# Altium PCB PCI Express Mini L1.PCBDOC (part 1 of 7)
Units mm, origin at the board's own origin, x right, y up, seen from the top; angles counter-clockwise.
Board outline 70 x 83.2 mm, 6 copper layers (TopLayer, Layer 1, Layer 2, Layer 3, Layer 4, Bottom Layer), stack 0.914 mm thick; 402 components, 242 nets, 1301 pads, 522 vias.
Unrouted connection lines stored in the file: 225.
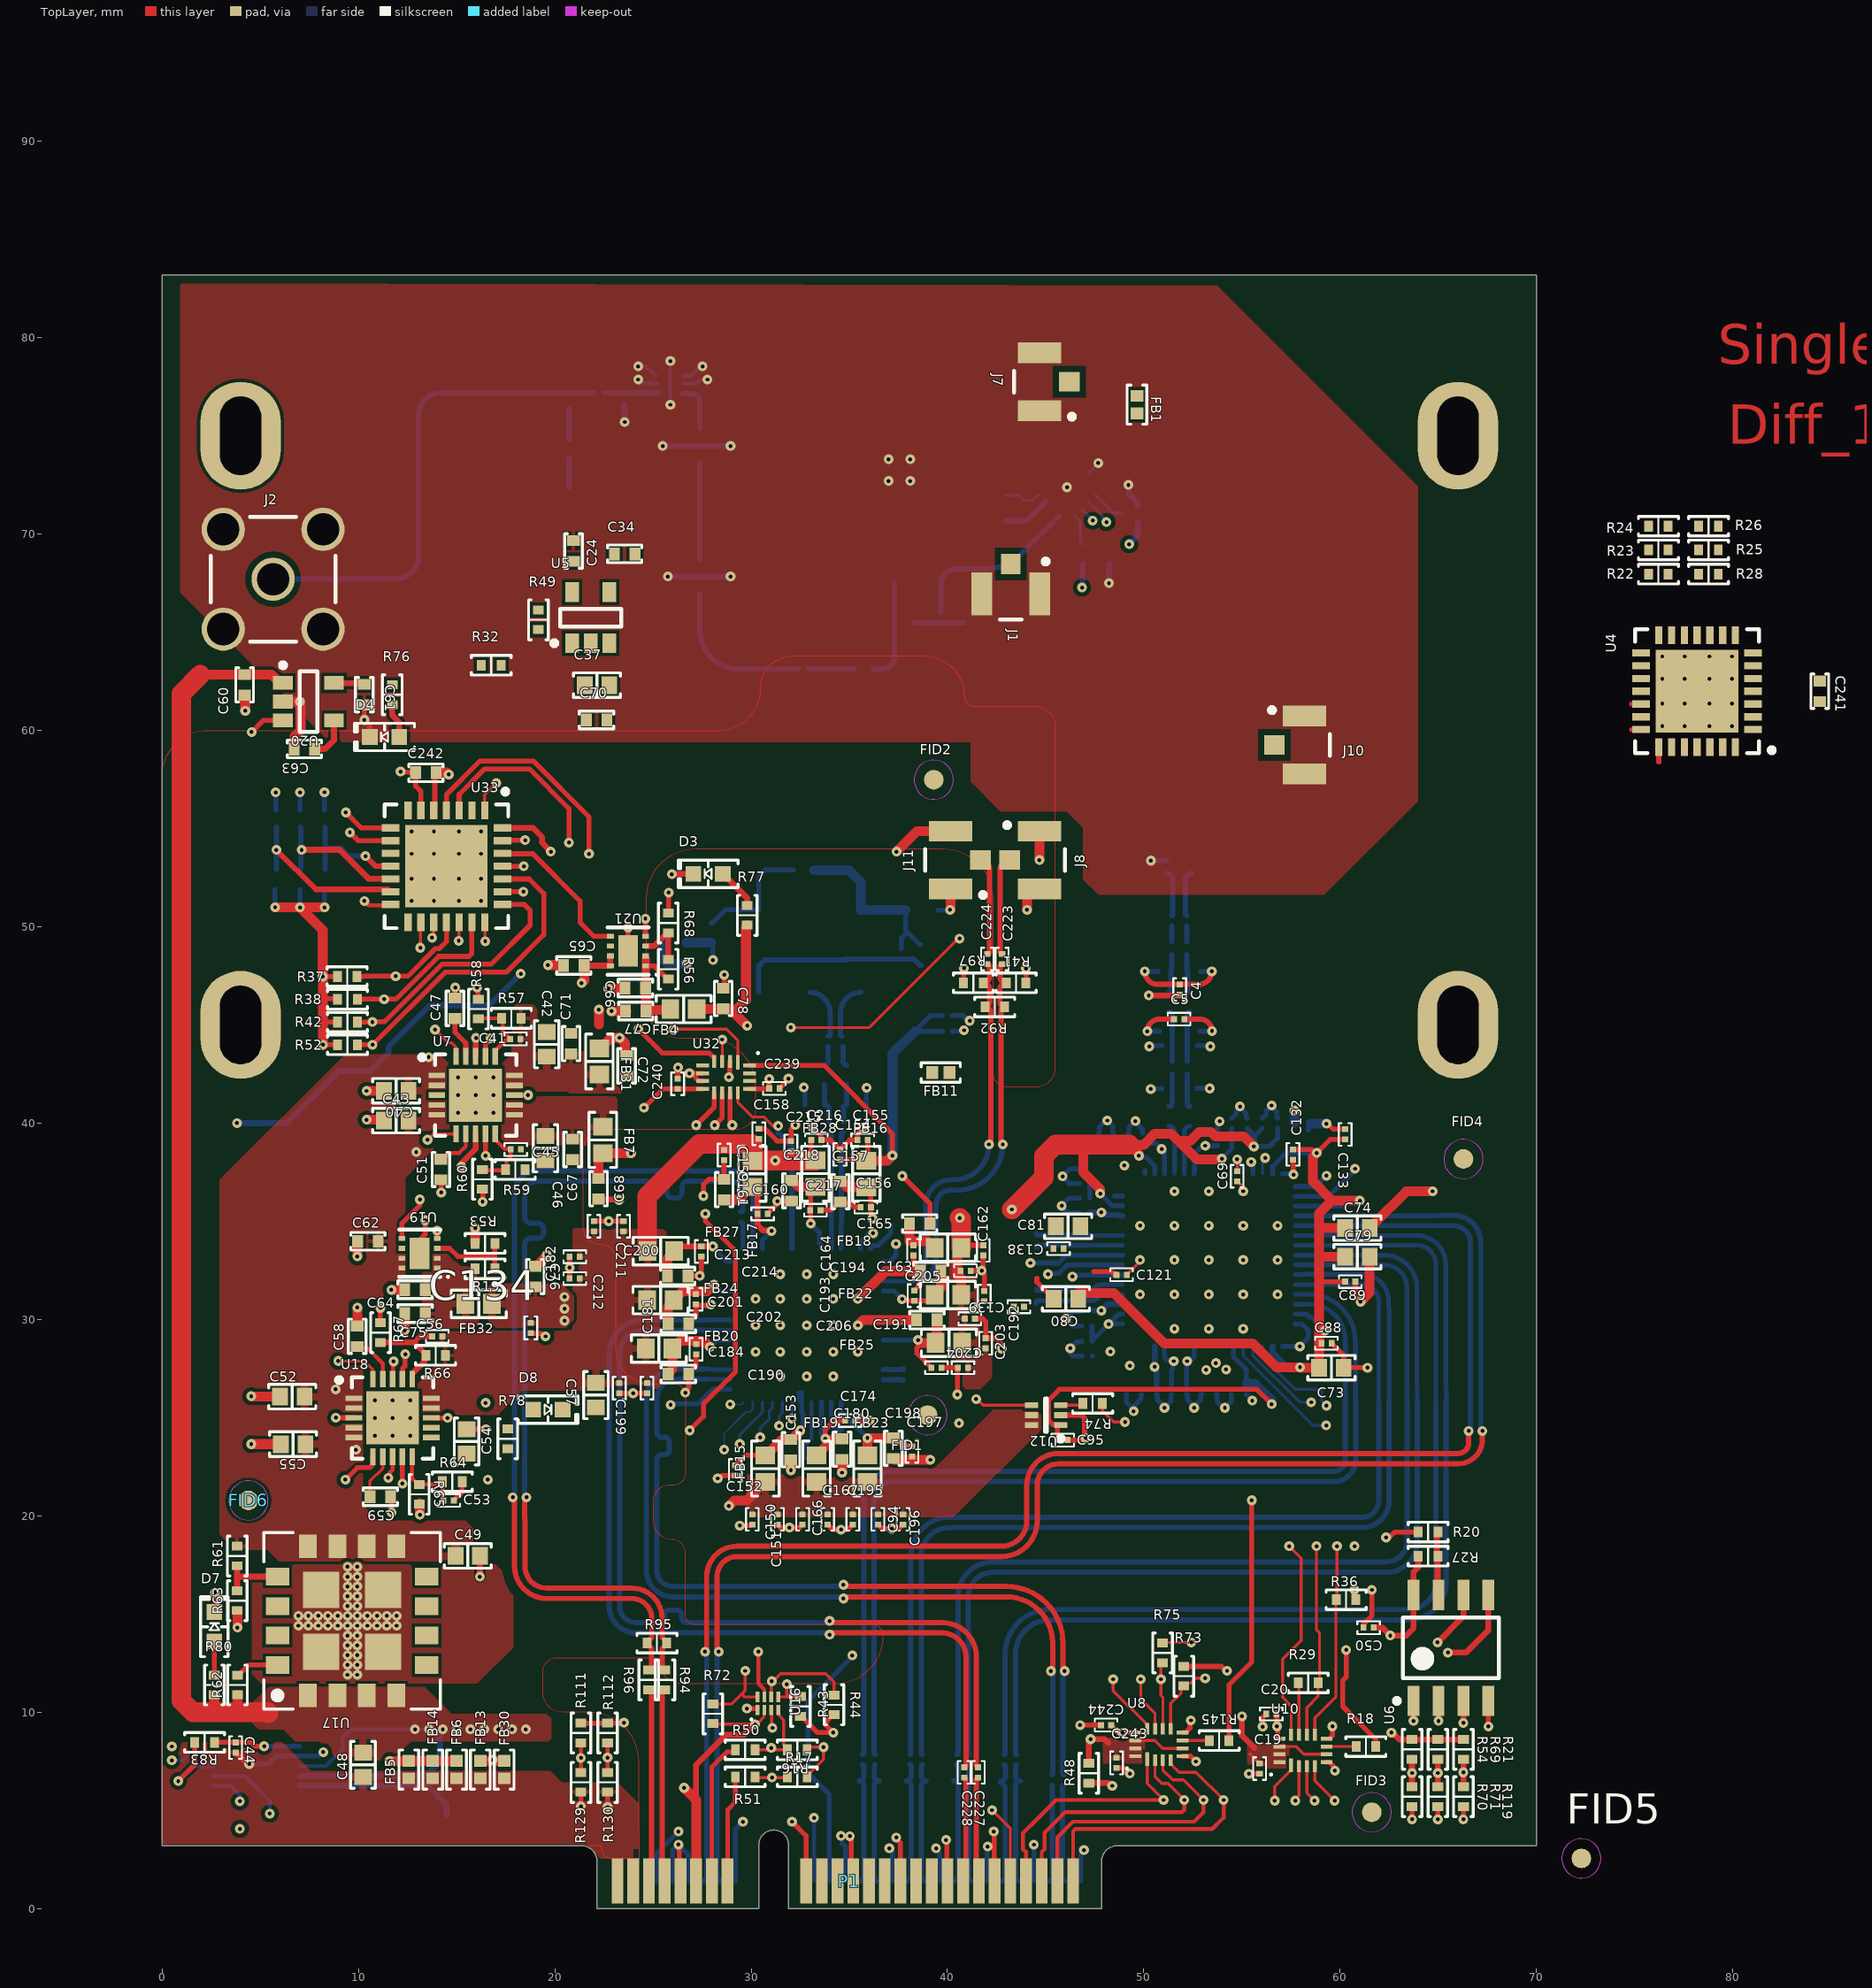
[diagram p0: TopLayer view]
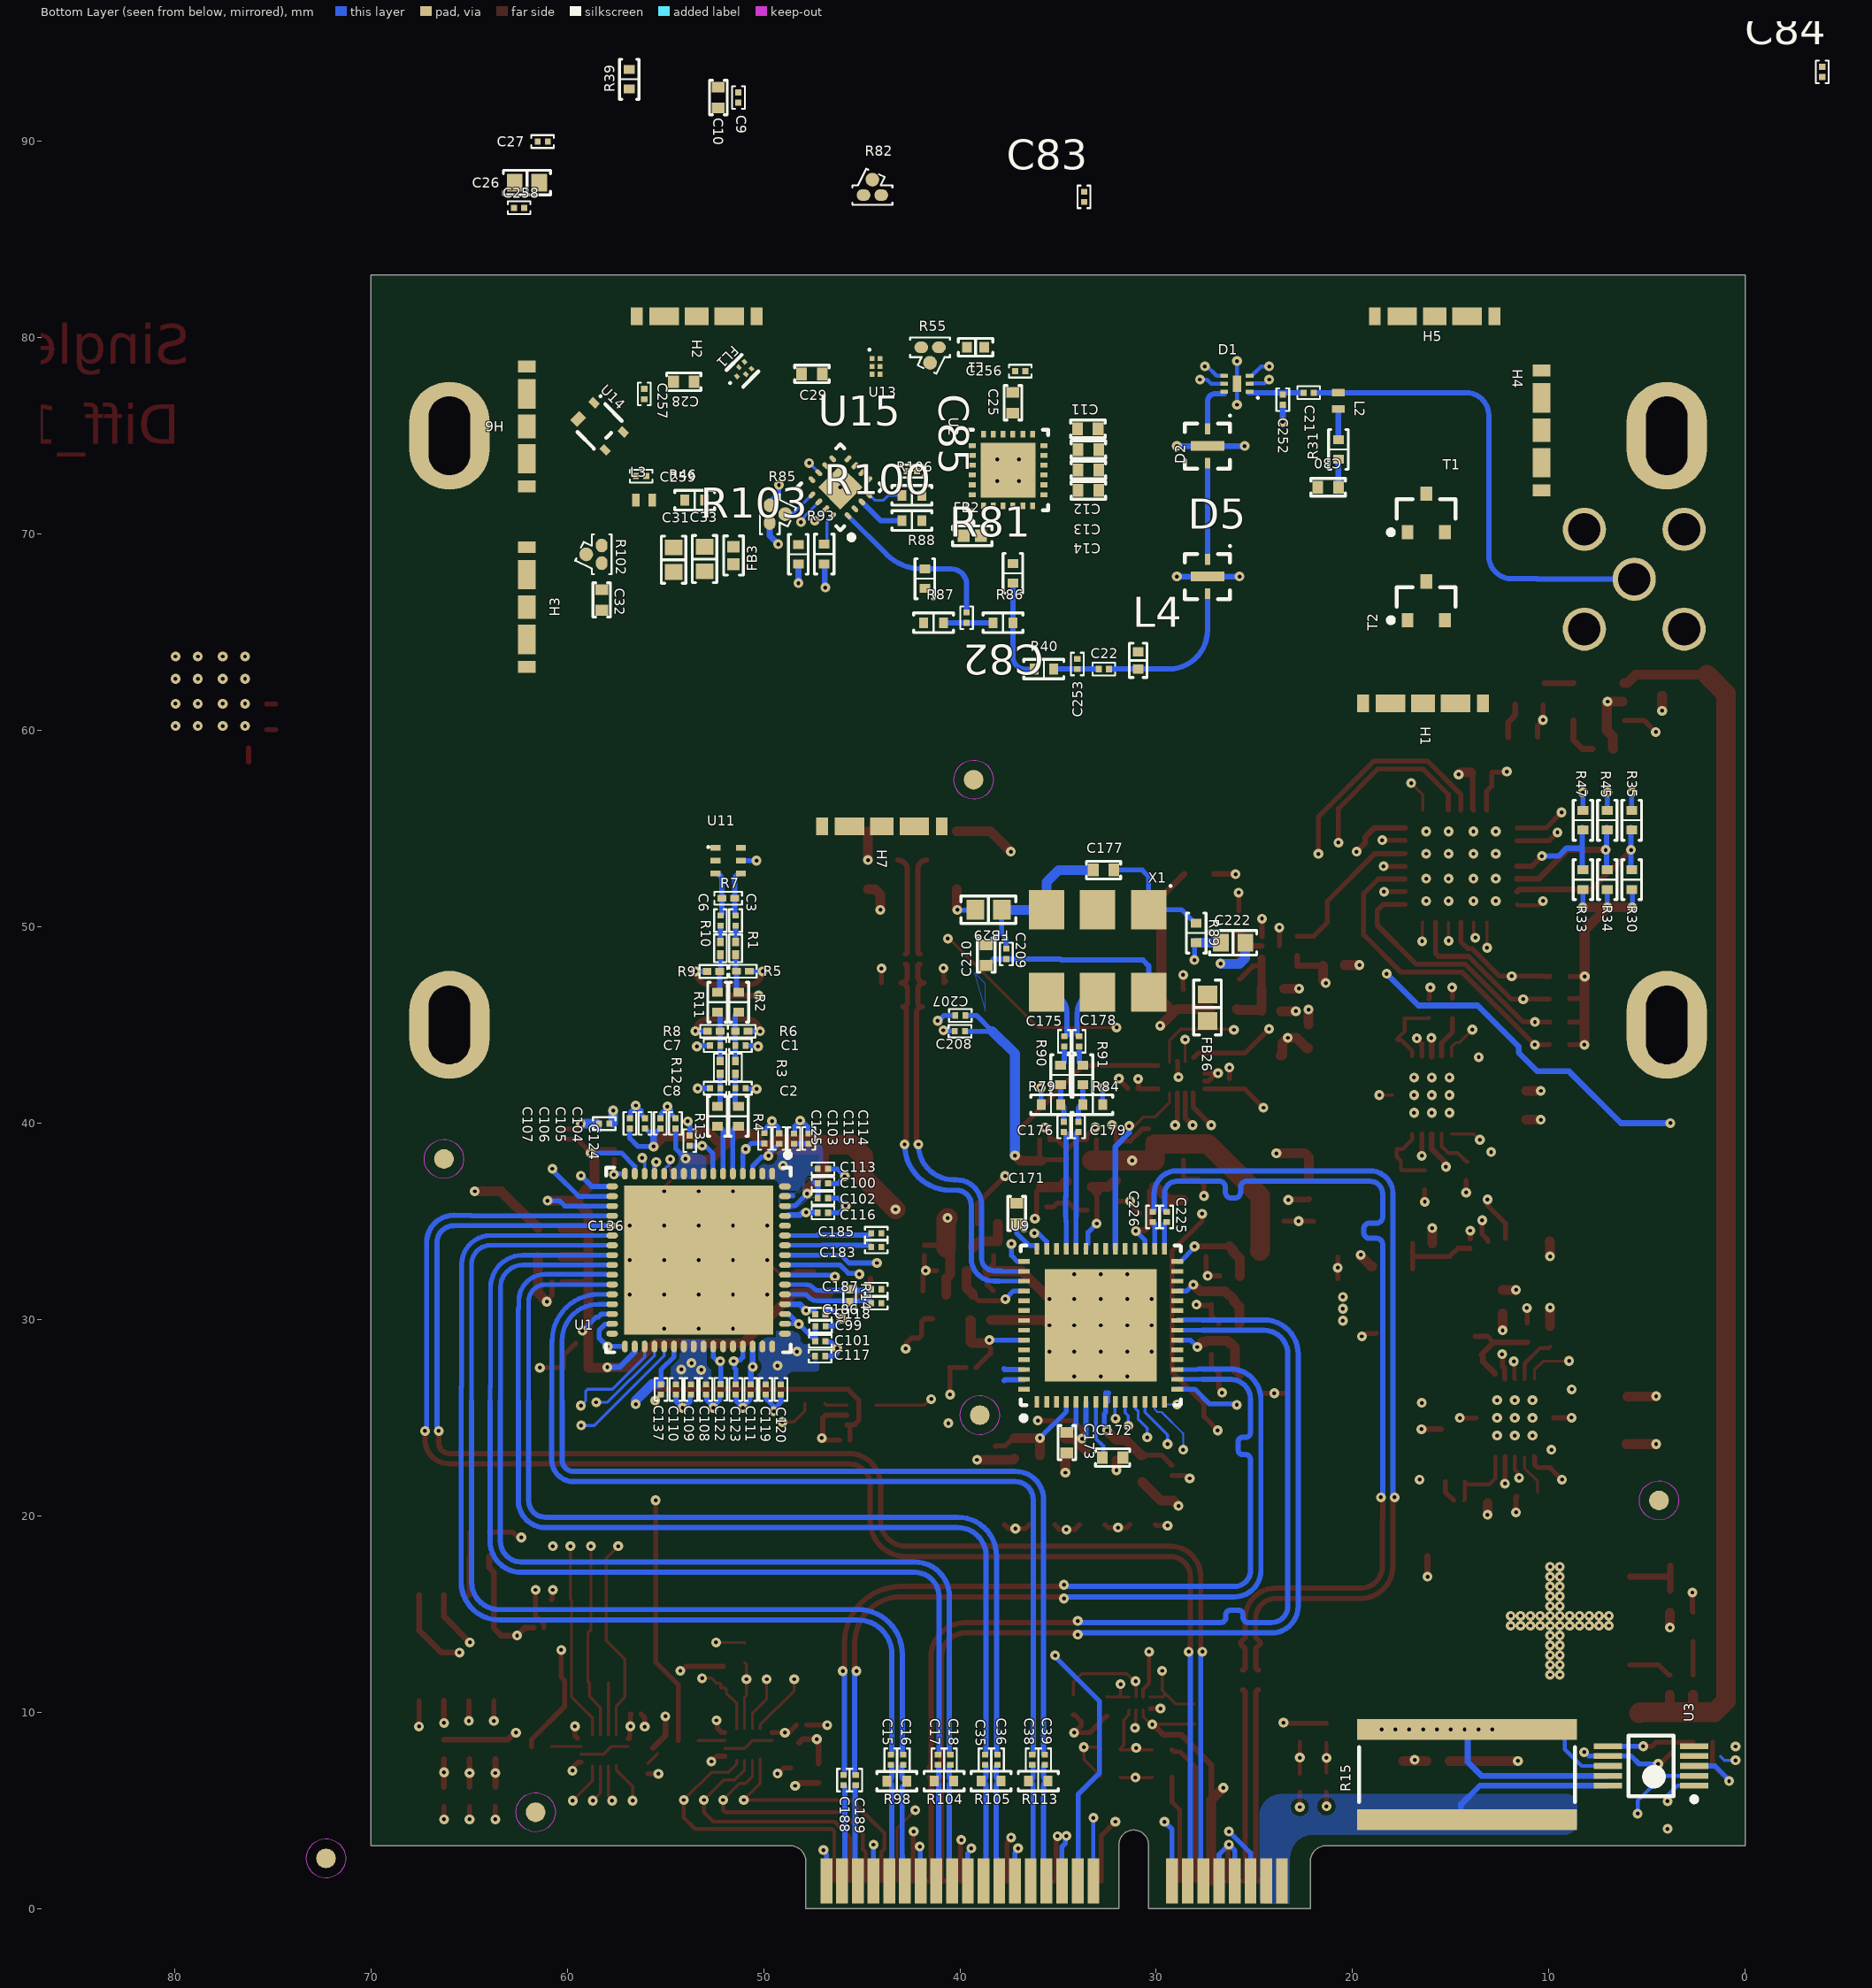
[diagram p1: Bottom Layer view, seen from below]
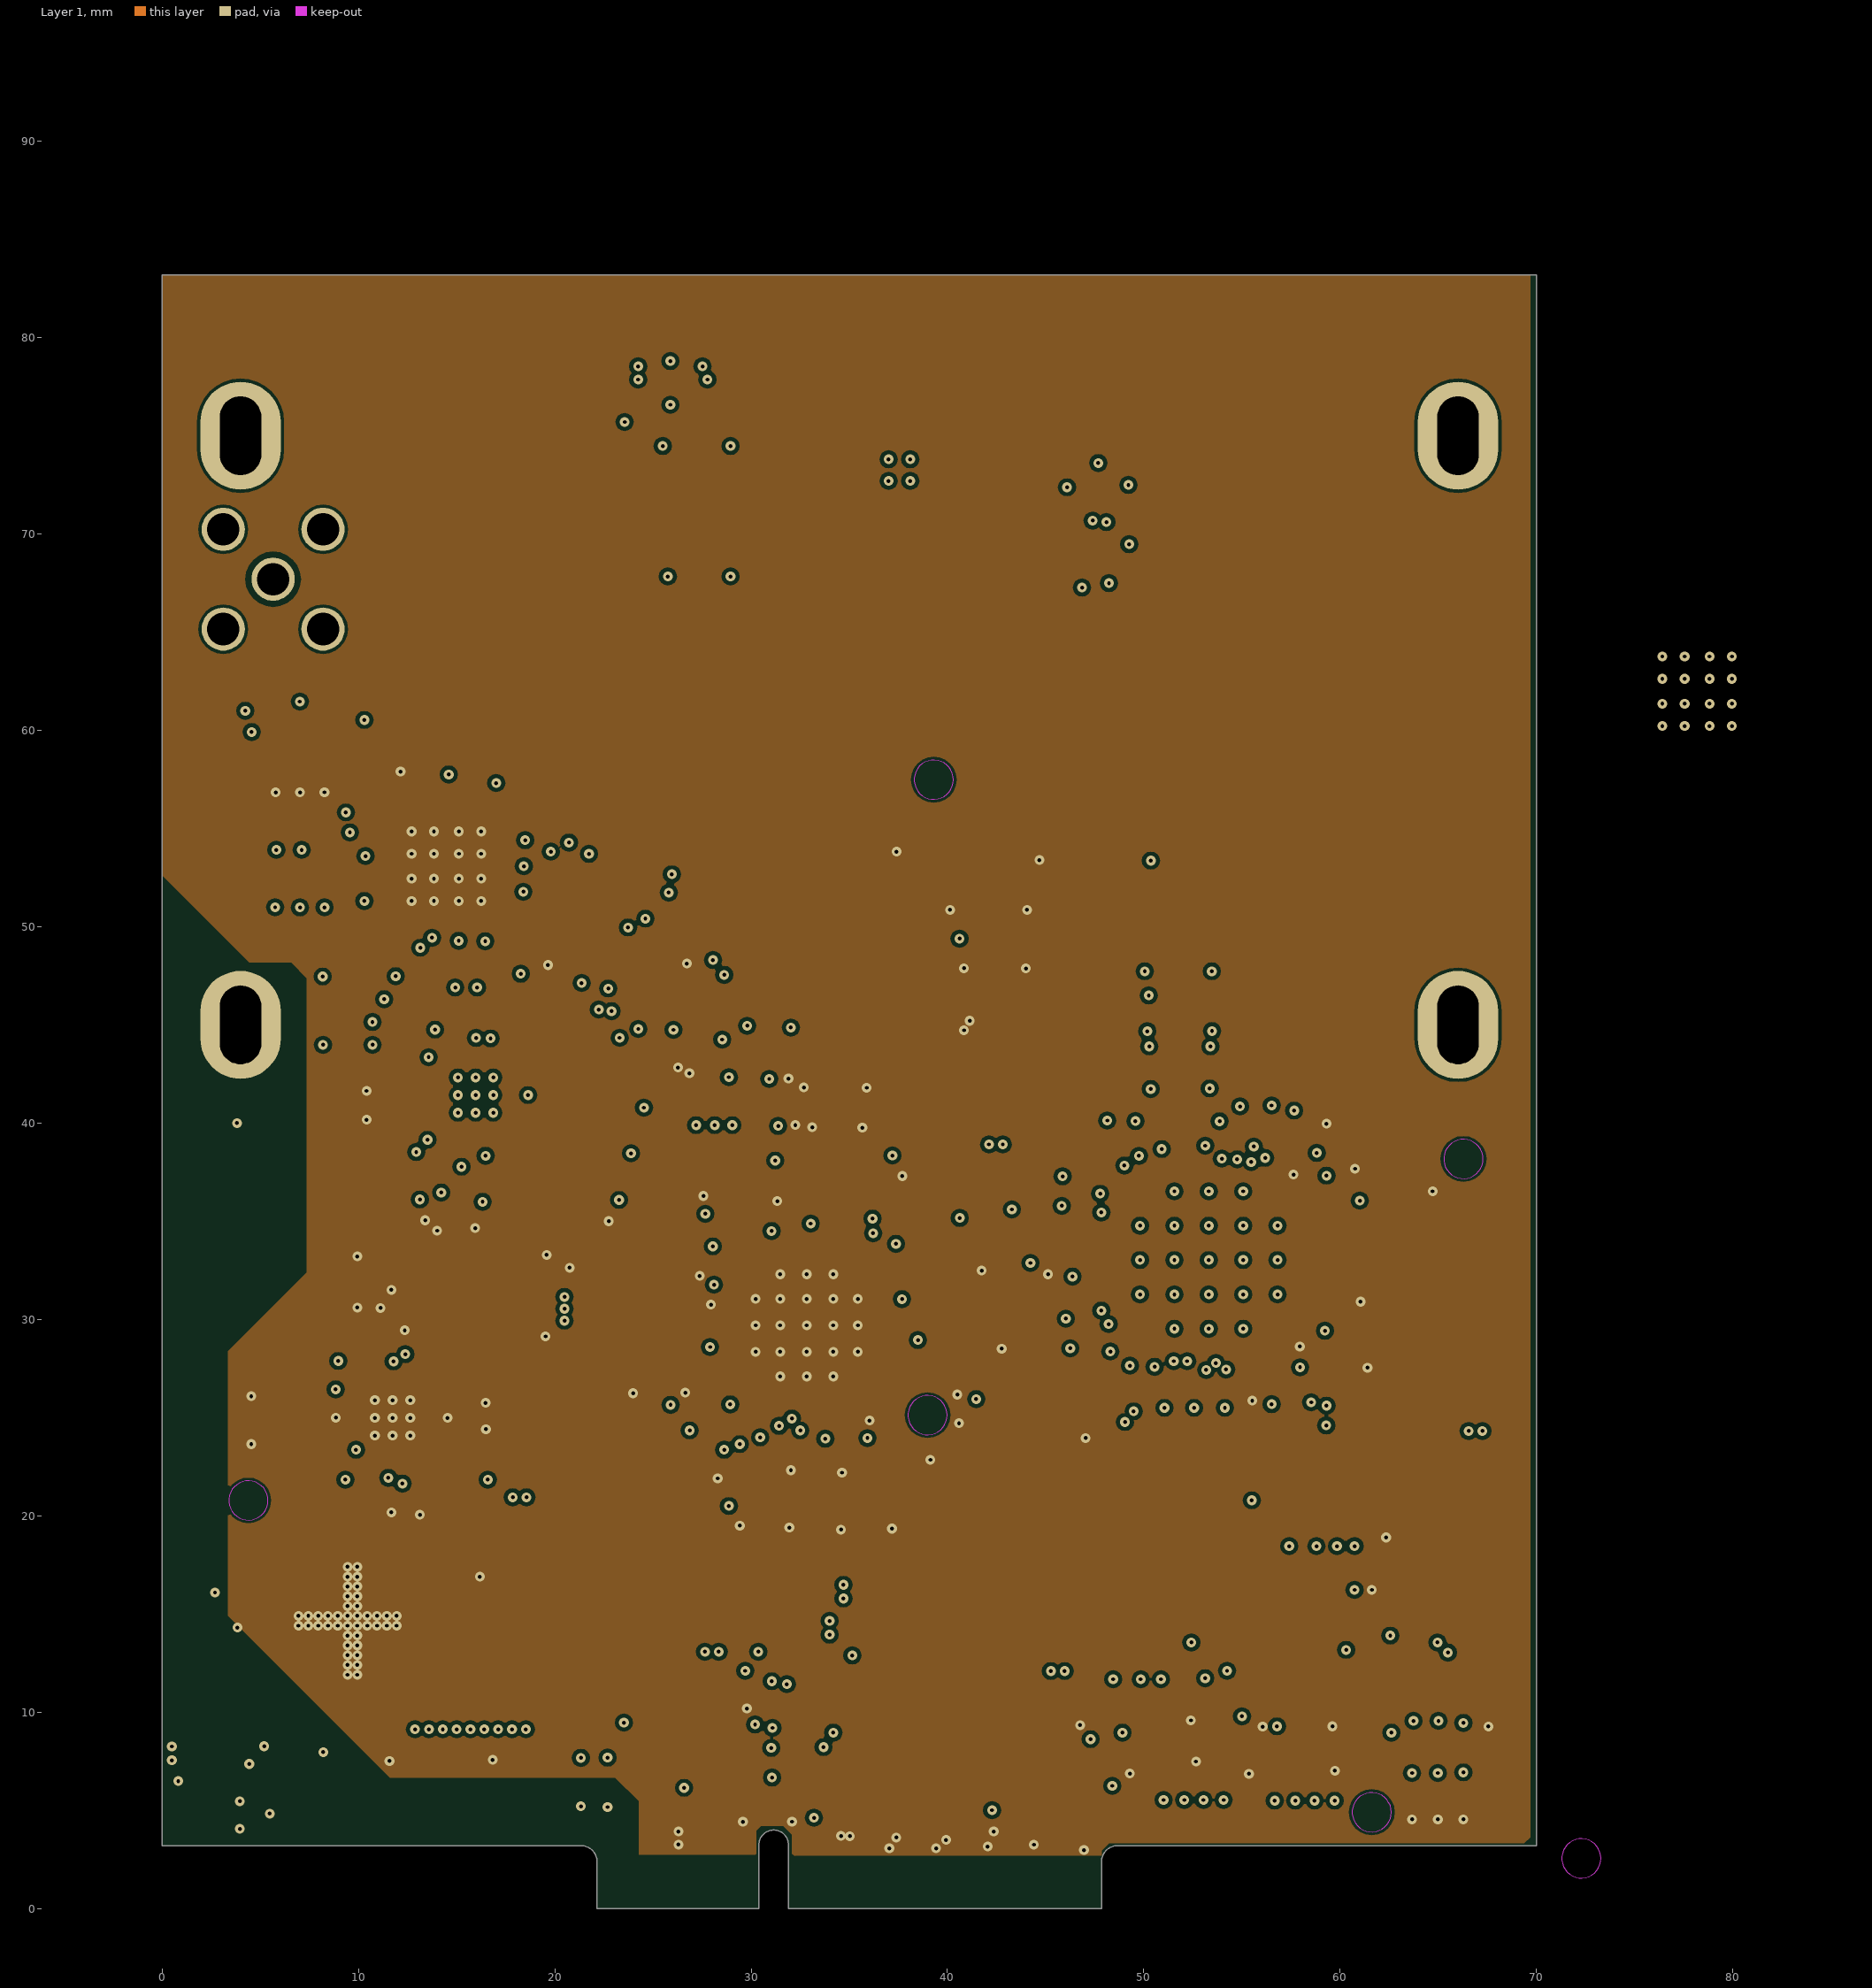
[diagram p2: Layer 1]
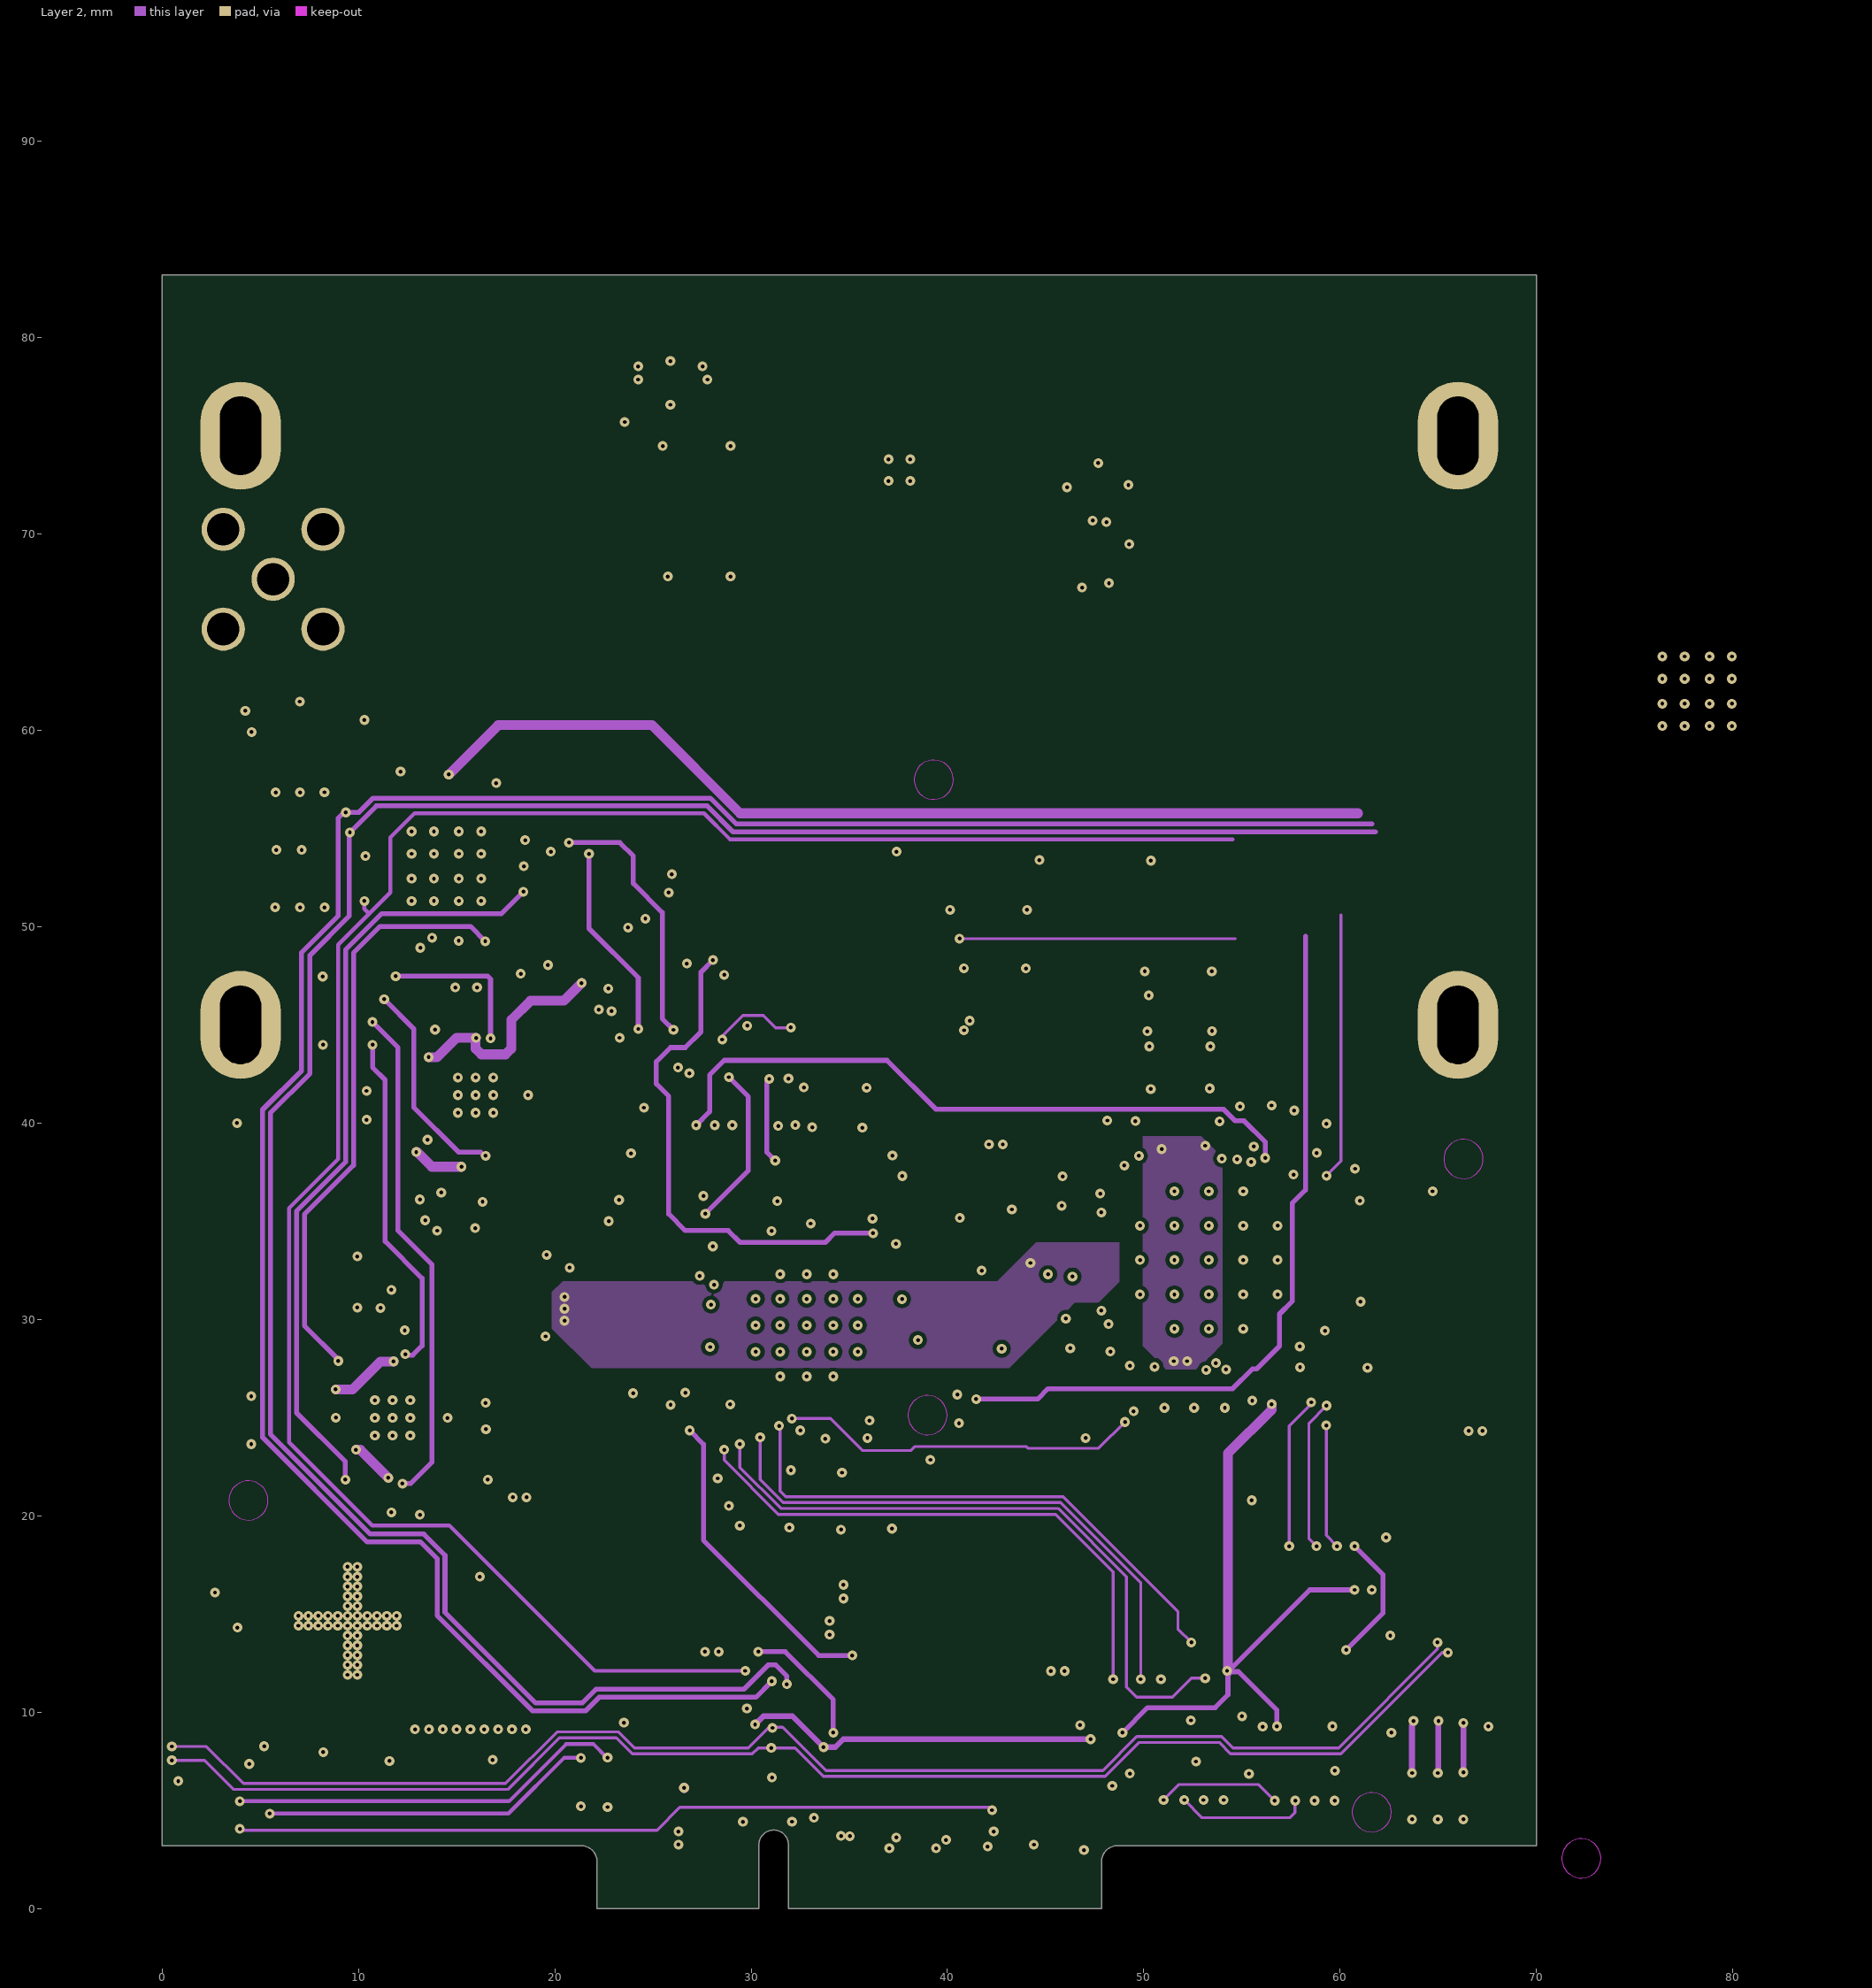
[diagram p3: Layer 2]
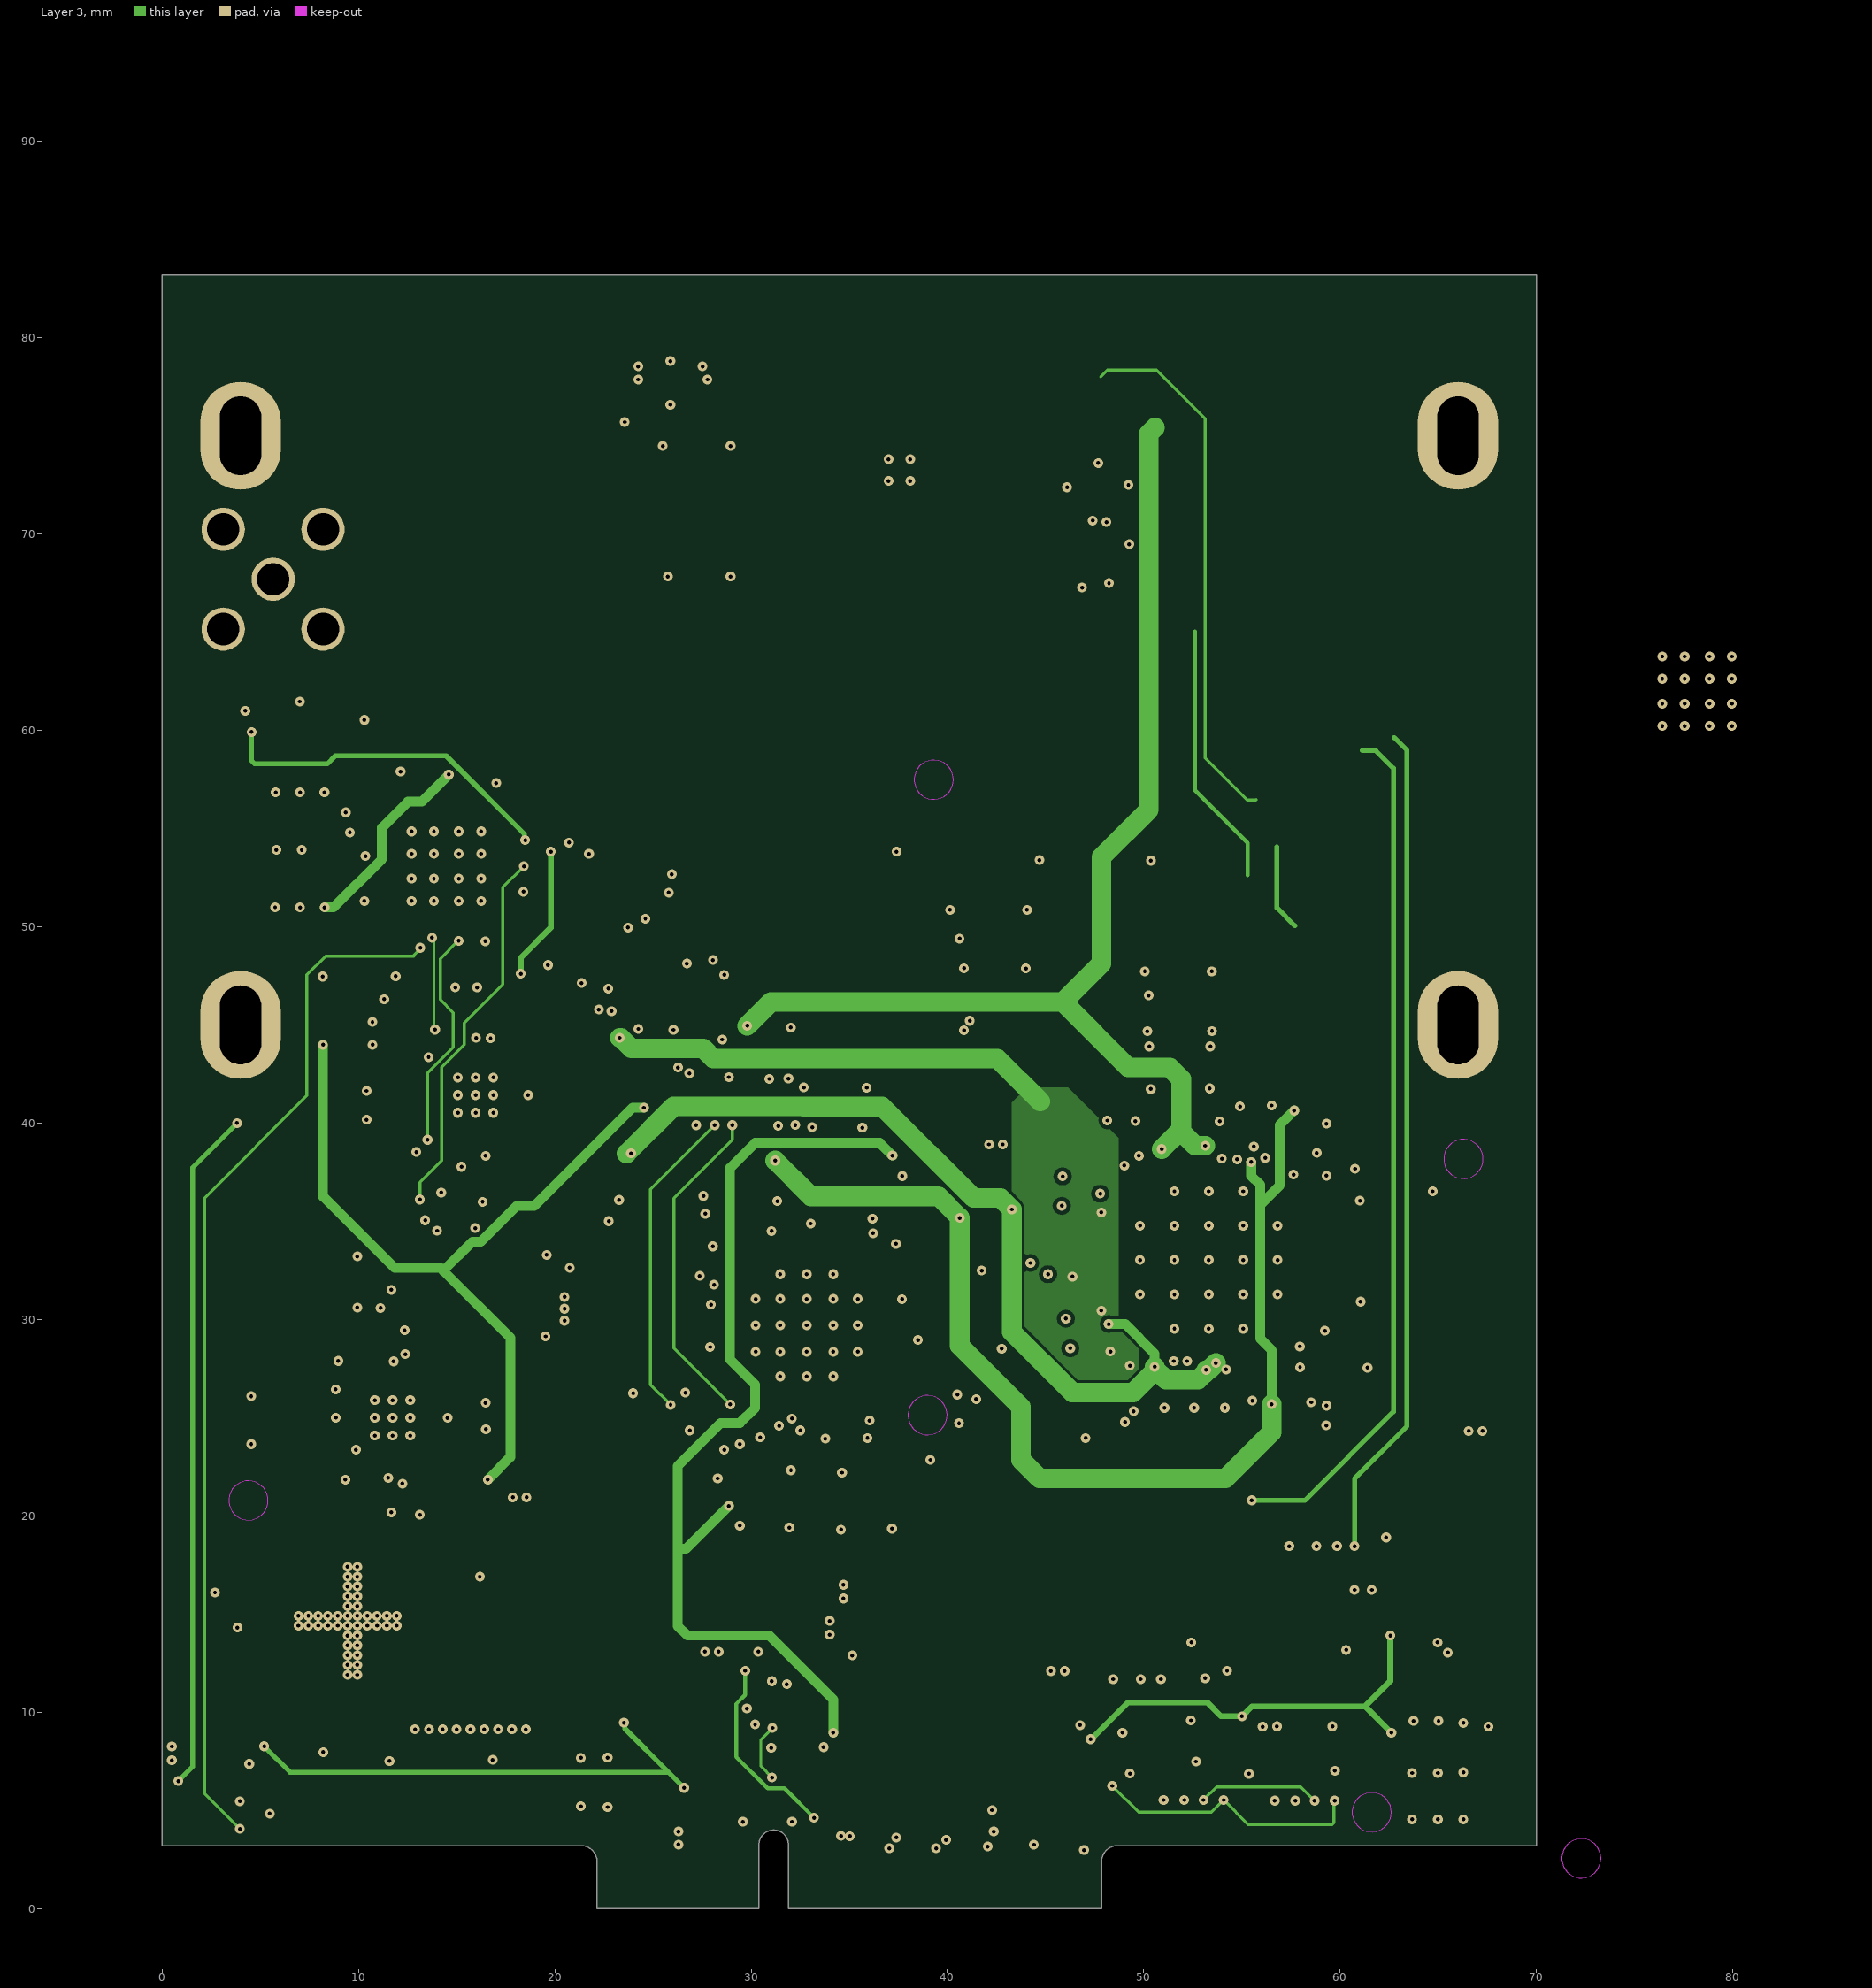
[diagram p4: Layer 3]
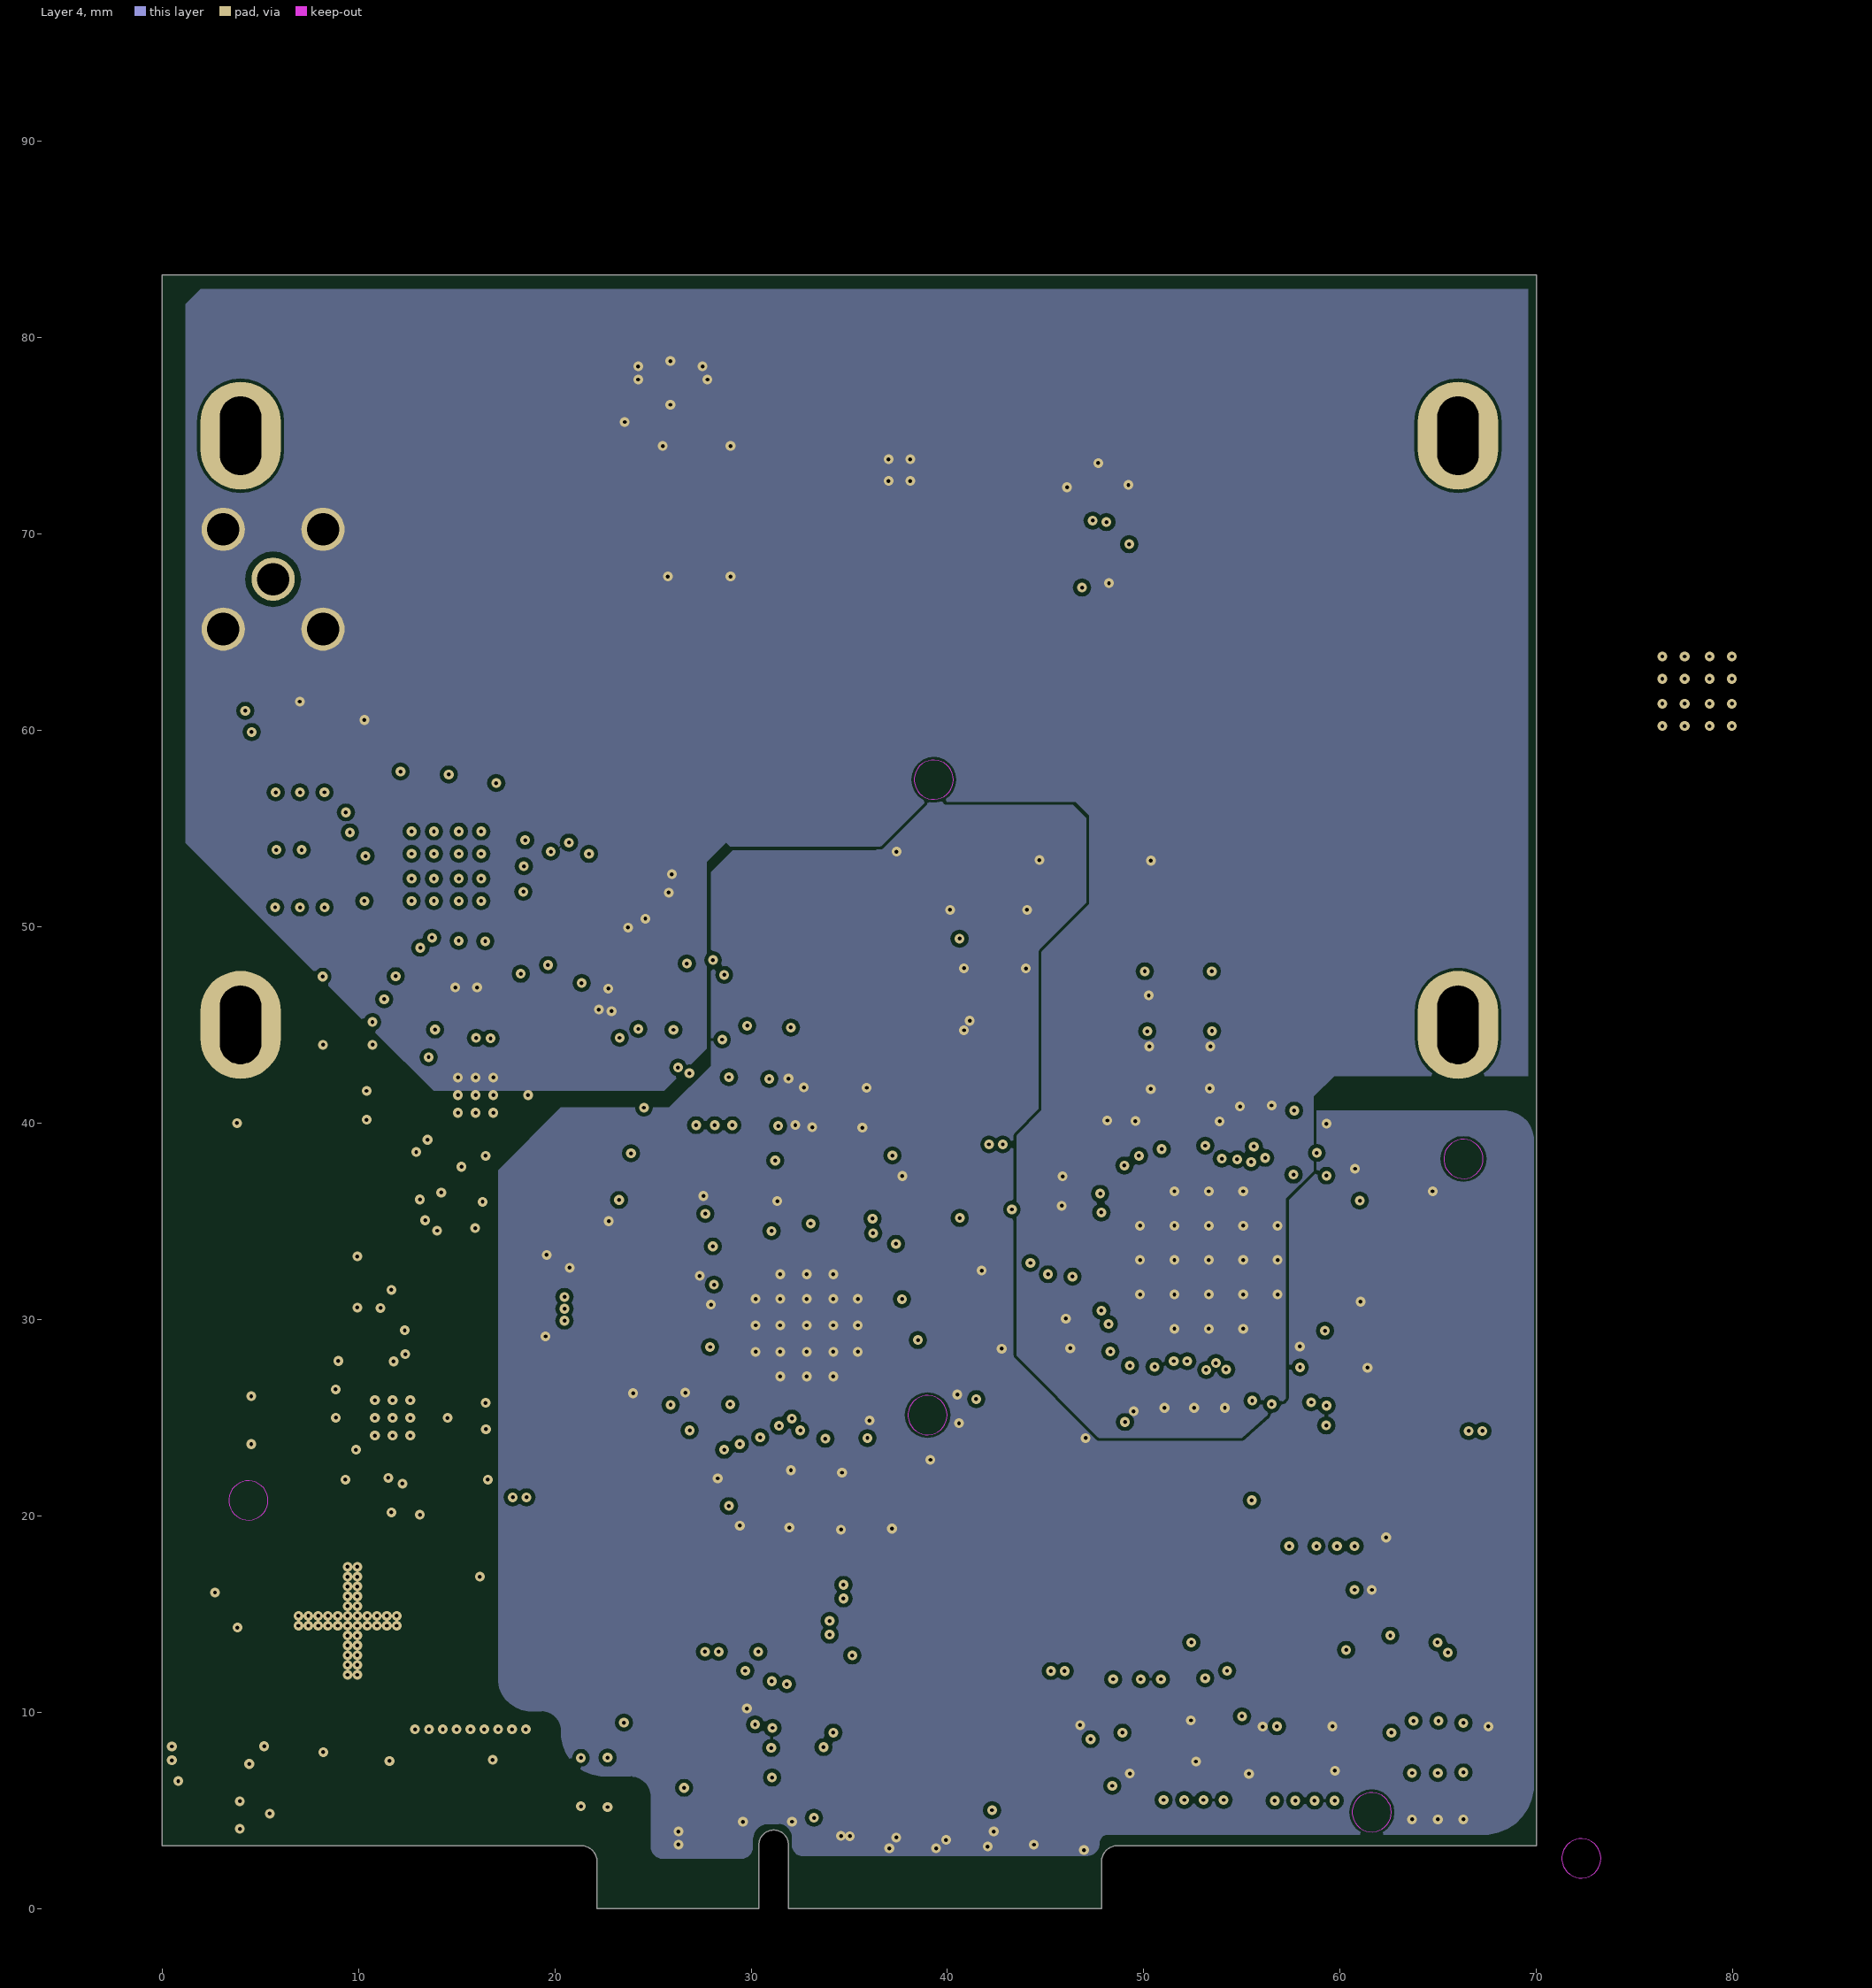
[diagram p5: Layer 4]

## Layer stack, top to bottom
TopSolder: solder mask 0.01, Solder Resist, Dk 3.5
TopLayer: signal copper 0.017
Dielectric1: prepreg 0.16, PP-018, Dk 4.29
Layer 1: signal copper 0.053
Dielectric 2: core 0.094, Core-016, Dk 3.96
Layer 2: signal copper 0.053
Dielectric2: prepreg 0.16, PP-018, Dk 4.29
Layer 3: signal copper 0.053
Dielectric 3: core 0.094, Core-016, Dk 3.96
Layer 4: signal copper 0.053
Dielectric 1: prepreg 0.16, PP-018, Dk 4.29
Bottom Layer: signal copper 0.017
Bottom Solder: solder mask 0.01, Solder Resist, Dk 3.5

## Board outline
22.15,2.4 ccw(c21.35,2.4) 21.35,3.2 0,3.2 0,83.2 70,83.2 70,3.2 48.65,3.2 ccw(c48.65,2.4) 47.85,2.4 47.85,0 31.9,0 31.9,3.25 ccw(c31.15,3.25) 30.4,3.25 30.4,0 22.15,0

## Design rules (kind name [scope] priority, off if disabled: settings)
Clearance Clearance_VIA [IsVia] p1: gap=0.2 ignorepadtopadclearanceinfootprint=TRUE
Clearance Clearance_Diff_1 [InAnyDifferentialPair] p2: gap=0.5 ignorepadtopadclearanceinfootprint=TRUE except(0.23: Arc-Arc Arc-Track Arc-SMDPad Arc-Via Track-Track Track-SMDPad Track-Via SMDPad-SMDPad SMDPad-Via THPad-Via Via-Via)
Clearance Clearance_Diff [InAnyDifferentialPair] p3: gap=0.5 ignorepadtopadclearanceinfootprint=TRUE except(0.2: Arc-SMDPad; 0.23: Arc-Arc Arc-Track Arc-Via Track-Track Track-SMDPad Track-Via SMDPad-SMDPad SMDPad-Via THPad-Via Via-Via)
Clearance Clearance_50 [InNetClass('Single50')] p4: gap=0.3 ignorepadtopadclearanceinfootprint=TRUE except(0.15: Arc-SMDPad Track-SMDPad; 0.25: Arc-Arc Arc-Track Track-Track)
Clearance "Clearance_Edge Connector" [(InComponentClass('Edge Connector')) vs (InComponentClass('Edge Connector'))] p5: gap=0.2 ignorepadtopadclearanceinfootprint=TRUE except(0: Arc-Hole Track-Hole SMDPad-Hole THPad-Hole Via-Hole Fill-Hole Poly-Hole Region-Hole Text-Hole)
Clearance [All] p6: gap=0.15 ignorepadtopadclearanceinfootprint=TRUE
DiffPairsRouting Diff_100_0406 [InDifferentialPairClass('Diff_100') and WithinRoom('ROOM_0406')] p1: maxlimit=0.527 minlimit=0.24 mostfreqgap=0.254 toplayer_mingap=0.25 toplayer_maxgap=0.26 toplayer_prefgap=0.26 toplayer_minwidth=0.24 toplayer_maxwidth=0.268 toplayer_prefwidth=0.24 bottomlayer_mingap=0.25 bottomlayer_maxgap=0.26 bottomlayer_prefgap=0.26 bottomlayer_minwidth=0.24 bottomlayer_maxwidth=0.268 bottomlayer_prefwidth=0.24 impedanceprofiledriven=TRUE impedanceprofileid={E447CCB2-F64F-46AA-A652-460A0891FB1B} impedanceprofilevalue=100.000000 maxuncoupledlength=12.7
DiffPairsRouting Diff_100_0406_2 [InDifferentialPairClass('Diff_100') and WithinRoom('ROOM_0406_2')] p2: maxlimit=0.527 minlimit=0.24 mostfreqgap=0.254 toplayer_mingap=0.25 toplayer_maxgap=0.26 toplayer_prefgap=0.26 toplayer_minwidth=0.24 toplayer_maxwidth=0.268 toplayer_prefwidth=0.24 bottomlayer_mingap=0.25 bottomlayer_maxgap=0.26 bottomlayer_prefgap=0.26 bottomlayer_minwidth=0.24 bottomlayer_maxwidth=0.268 bottomlayer_prefwidth=0.24 impedanceprofiledriven=TRUE impedanceprofileid={E447CCB2-F64F-46AA-A652-460A0891FB1B} impedanceprofilevalue=100.000000 maxuncoupledlength=12.7
DiffPairsRouting Diff_100 [InDifferentialPairClass('Diff_100')] p3: maxlimit=0.527 minlimit=0.24 mostfreqgap=0.254 toplayer_mingap=0.26 toplayer_maxgap=0.26 toplayer_prefgap=0.26 toplayer_minwidth=0.268 toplayer_maxwidth=0.268 toplayer_prefwidth=0.268 bottomlayer_mingap=0.26 bottomlayer_maxgap=0.26 bottomlayer_prefgap=0.26 bottomlayer_minwidth=0.268 bottomlayer_maxwidth=0.268 bottomlayer_prefwidth=0.268 impedanceprofiledriven=TRUE impedanceprofileid={4EC12C71-731A-4A04-9E39-5B54F8BA15AE} impedanceprofilevalue=100.000000 maxuncoupledlength=12.7
FabricationTestPointUsage TestPointUsage [All] p1: valid=0 allowmultiple=FALSE
FabricationTestpoint Testpoint [All] p1: side=3 testpointundercomponent=TRUE minsize=1.016 maxsize=2.54 preferedsize=1.524 minholesize=0.508 maxholesize=1.016 preferedholesize=0.813 testpointgrid=0.025 allowsidetop=TRUE allowsidebottom=TRUE usegrid=TRUE gridtolerance=0
Height "PCI Express Mini, \"Component height constraints\", Page 18, bottom side" [OnBottomLayer] p1: minheight=0 maxheight=1.35 prefheight=1.35
Height "PCI Express Mini, \"Component height constraints\", Page 18, top side" [OnTopLayer] p2: minheight=0 maxheight=2.4 prefheight=2.4
Length "Schematic Length Constraint" [InNetClass('SYNC')] p1: maxlimit=71 minlimit=70
Length CLK_OUT_TO_FPGA [InNetClass('FPGA_CLK') or InDifferentialPair('O1') or InDifferentialPair('O3')] p2: maxlimit=55.5 minlimit=55
Length ADC_DATA_OUT_TO_CAP [InNetClass('Dlugosc') or InDifferentialPair('CMLout1_ADC') or InDifferentialPair('CMLout2_ADC') or InDifferentialPair('CMLout3_ADC') or InDifferentialPair('CMLout4_ADC')] p3: maxlimit=59.5 minlimit=58.5
MatchedLengths MatchedLengths_CLK_res_Adc [InNetClass('ADC_CLK')] p1: tolerance=0.2 checknetsindiffpair=FALSE checkdiffpairvsdiffpair=TRUE checkxsignals=TRUE checkothers=TRUE
MatchedLengths MatchedLengths_CLK_res_Adc_1 [InNetClass('Len_CLK_ADC')] p2: tolerance=0.2 checknetsindiffpair=FALSE checkdiffpairvsdiffpair=TRUE checkxsignals=TRUE checkothers=TRUE
MatchedLengths MatchedLengthsAllDiff [InDifferentialPairClass('All Differential Pairs')] p3: tolerance=0.3 checknetsindiffpair=TRUE checkdiffpairvsdiffpair=FALSE checkxsignals=FALSE checkothers=FALSE
MatchedLengths MATCH_CML_TO_CAP [InNetClass('Dlugosc')] p4: tolerance=1.2 checknetsindiffpair=FALSE checkdiffpairvsdiffpair=TRUE checkxsignals=TRUE checkothers=TRUE
MatchedLengths Match_FPGA_CLK [InNetClass('FPGA_CLK')] p5: tolerance=1.2 checknetsindiffpair=FALSE checkdiffpairvsdiffpair=TRUE checkxsignals=TRUE checkothers=TRUE
PlaneClearance [All] p1: clearance=0.5
PlaneConnect [All] p1: planeconnectstyle=Direct reliefexpansion=0.508 reliefentries=4 reliefconductorwidth=0.254 reliefairgap=0.254
PolygonConnect "Connect Res0201" [HasFootprint('RES 0201/0603')] p1: thpad.connectstyle=Direct thpad.reliefconductorwidth=0.254 thpad.reliefentries=4 thpad.polygonreliefangle="90 Angle" thpad.airgapwidth=0.254 smdpad.connectstyle=Relief smdpad.reliefconductorwidth=0.2 smdpad.reliefentries=4 smdpad.polygonreliefangle="90 Angle" smdpad.airgapwidth=0.2 via.connectstyle=Direct via.reliefconductorwidth=0.254 via.reliefentries=4 via.polygonreliefangle="90 Angle" via.airgapwidth=0.254
PolygonConnect "Connect CAP0201" [HasFootprint('CAP 0201/0603 KK')] p2: thpad.connectstyle=Direct thpad.reliefconductorwidth=0.254 thpad.reliefentries=4 thpad.polygonreliefangle="90 Angle" thpad.airgapwidth=0.254 smdpad.connectstyle=Relief smdpad.reliefconductorwidth=0.2 smdpad.reliefentries=4 smdpad.polygonreliefangle="90 Angle" smdpad.airgapwidth=0.2 via.connectstyle=Direct via.reliefconductorwidth=0.254 via.reliefentries=4 via.polygonreliefangle="90 Angle" via.airgapwidth=0.254
PolygonConnect "Connect CAP0402" [HasFootprint('CAP 0402/1005 RF KK') or HasFootprint('CAP 0402/1005 KK')] p3: thpad.connectstyle=Direct thpad.reliefconductorwidth=0.254 thpad.reliefentries=4 thpad.polygonreliefangle="90 Angle" thpad.airgapwidth=0.254 smdpad.connectstyle=Relief smdpad.reliefconductorwidth=0.2 smdpad.reliefentries=4 smdpad.polygonreliefangle="90 Angle" smdpad.airgapwidth=0.2 via.connectstyle=Direct via.reliefconductorwidth=0.254 via.reliefentries=4 via.polygonreliefangle="90 Angle" via.airgapwidth=0.254
PolygonConnect "Connect CAP080" [HasFootprint('CAP 0805/2012 RF')] p4: thpad.connectstyle=Direct thpad.reliefconductorwidth=0.254 thpad.reliefentries=4 thpad.polygonreliefangle="90 Angle" thpad.airgapwidth=0.254 smdpad.connectstyle=Relief smdpad.reliefconductorwidth=0.55 smdpad.reliefentries=4 smdpad.polygonreliefangle="90 Angle" smdpad.airgapwidth=0.3 via.connectstyle=Direct via.reliefconductorwidth=0.254 via.reliefentries=4 via.polygonreliefangle="90 Angle" via.airgapwidth=0.254
PolygonConnect "Connect CAP0603" [HasFootprint('CAP 0603/1608 RF') or HasFootprint('CAP 0603/1608')] p5: thpad.connectstyle=Direct thpad.reliefconductorwidth=0.254 thpad.reliefentries=4 thpad.polygonreliefangle="90 Angle" thpad.airgapwidth=0.254 smdpad.connectstyle=Relief smdpad.reliefconductorwidth=0.4 smdpad.reliefentries=4 smdpad.polygonreliefangle="90 Angle" smdpad.airgapwidth=0.25 via.connectstyle=Direct via.reliefconductorwidth=0.254 via.reliefentries=4 via.polygonreliefangle="90 Angle" via.airgapwidth=0.254
PolygonConnect "Connect FB0603_1" [HasFootprint('FER 0603/1608') or HasFootprint('FER 0603/1608 KK')] p6: thpad.connectstyle=Direct thpad.reliefconductorwidth=0.254 thpad.reliefentries=4 thpad.polygonreliefangle="90 Angle" thpad.airgapwidth=0.254 smdpad.connectstyle=Relief smdpad.reliefconductorwidth=0.35 smdpad.reliefentries=4 smdpad.polygonreliefangle="90 Angle" smdpad.airgapwidth=0.2 via.connectstyle=Direct via.reliefconductorwidth=0.254 via.reliefentries=4 via.polygonreliefangle="90 Angle" via.airgapwidth=0.254
PolygonConnect "Connect Res0402" [HasFootprint('RES 0402/1005 RF KK') or HasFootprint('RES 0402/1005 KK')] p7: thpad.connectstyle=Direct thpad.reliefconductorwidth=0.254 thpad.reliefentries=4 thpad.polygonreliefangle="90 Angle" thpad.airgapwidth=0.254 smdpad.connectstyle=Relief smdpad.reliefconductorwidth=0.2 smdpad.reliefentries=4 smdpad.polygonreliefangle="90 Angle" smdpad.airgapwidth=0.2 via.connectstyle=Direct via.reliefconductorwidth=0.254 via.reliefentries=4 via.polygonreliefangle="90 Angle" via.airgapwidth=0.254
PolygonConnect "Connect Res06031" [HasFootprint('RES 0603/1608')] p8: thpad.connectstyle=Direct thpad.reliefconductorwidth=0.254 thpad.reliefentries=4 thpad.polygonreliefangle="90 Angle" thpad.airgapwidth=0.254 smdpad.connectstyle=Relief smdpad.reliefconductorwidth=0.4 smdpad.reliefentries=4 smdpad.polygonreliefangle="90 Angle" smdpad.airgapwidth=0.25 via.connectstyle=Direct via.reliefconductorwidth=0.254 via.reliefentries=4 via.polygonreliefangle="90 Angle" via.airgapwidth=0.254
PolygonConnect Power_Line1 [InNetClass('Power_Line')] p9: connectstyle=Direct reliefconductorwidth=0.254 reliefentries=4 polygonreliefangle="90 Angle" airgapwidth=0.254
PolygonConnect [All] p10: connectstyle=Direct reliefconductorwidth=0.254 reliefentries=4 polygonreliefangle="90 Angle" airgapwidth=0.254
ReturnPath [InNetClass('Diff_100')] p1: impedanceprofileid={4EC12C71-731A-4A04-9E39-5B54F8BA15AE} _gaplimit=1 _useantipads=TRUE
RoomDefinition ROOM_0406 [False] p1: confinementstyle=ConfineIn formatcopy=TRUE lockcomponents=FALSE outline 47.006,25.857 65.775,25.857 65.775,40.213 47.006,40.213
RoomDefinition ROOM_0406_2 [False] p2: confinementstyle=ConfineIn formatcopy=TRUE lockcomponents=FALSE outline 27.659,23.53 37.996,23.53 37.996,35.262 27.659,35.262
RoomDefinition "Component keep out area bottom" [Not (InComponentClass('Edge Connector'))] p3: confinementstyle=ConfineOut formatcopy=TRUE lockcomponents=FALSE outline 20,5.1 50,5.1 50,3.138 48.65,3.138 48.321,3.064 48.092,2.915 47.915,2.666 47.85,2.354 47.85,0 22.15,0 22.15,2.354 22.083,2.69 21.956,2.89 21.626,3.089 21.35,3.138 20,3.138
RoomDefinition "Component keep out area top" [Not (InComponentClass('Edge Connector'))] p4: confinementstyle=ConfineOut formatcopy=TRUE lockcomponents=FALSE outline 21.35,3.2 21.4,3.25 30.2,3.25 30.2,4.2 32.1,4.2 32.1,3.25 32.15,3.2 48.45,3.2 ccw(c48.45,2.888) 48.229,3.109 48.016,2.896 ccw(c48.417,2.494) 47.85,2.494 47.85,0 22.15,0 22.15,2.513 ccw(c21.574,2.513) 21.981,2.921 21.814,3.088 ccw(c21.727,3.002) 21.727,3.124 ccw(c21.544,2.941) 21.544,3.2
RoutingVias [All] p1: holewidth=0.711 width=1.27 viastyle="Through Hole" minholewidth=0.711 minwidth=1.27 maxholewidth=0.711 maxwidth=1.27 useviatemplates=TRUE viatemplateguid#1={B53E485B-A7F0-464F-8AA1-CFDFD2A3AAA0} viatemplateguid#2={58BC0D68-6368-4C3A-A361-82061B0D58B2} viatemplateguid#3={6EE784A0-44F4-4A5A-A2C0-533F7653D8A2} viatemplateguid#4={87F42FCB-5CC3-426C-9BD1-0B2191F2542B} viatemplateguid#5={3A3E701C-EB47-4E11-930B-C72D353C3C4D} viatemplatename#1=v35h10m0mx0 viatemplatename#2=v40h20 viatemplatename#3=v45h15 viatemplatename#4=v45h15m0mx0 viatemplatename#5=v50h20m0mx0
SilkToSolderMaskClearance SilkscreenOverComponentPads [IsPad] p1: minsilkscreentomaskgap=0.254 clearancetoexposedcopper=TRUE
SolderMaskExpansion [HasPad('J2-M2')] p1: expansion=0 istentingtop=FALSE
Width Width_S_50 [InNetClass('Single50')] p1: maxlimit=0.281 minlimit=0.254 preferedwidth=0.254 toplayer_minwidth=0.268 toplayer_maxwidth=0.268 toplayer_prefwidth=0.268 bottomlayer_minwidth=0.268 bottomlayer_maxwidth=0.268 bottomlayer_prefwidth=0.268 impedanceprofiledriven=TRUE impedanceprofileid={40FFE645-052D-4050-9BA8-CD5BD897BE0C} impedanceprofilevalue=50.000000 minimp=50.000000 maximp=50.000000 favimp=50.000000
Width Width_POWER [InNetClass('Power_Line')] p2: maxlimit=1 minlimit=0.25 preferedwidth=0.5
Width Width_simple [All] p3: maxlimit=0.3 minlimit=0.15 preferedwidth=0.25
23 further rules are at their usual default settings.

## Classes and differential pairs
net class FPGA_CLK_1: CLKout1_N CLKout1_P CLKout3_N CLKout3_P
net class Len_CLK_ADC: ADC_CLK9690_N ADC_CLK9690_P SYNC_N SYNC_P
net class SPI_LMK: 04610_STATUS0 SPI__LMK_MOSI SPI_LMK_CLK SPI_LMK_CS SPI_LMK_MISO
net class SPI_AD: SPI_CLK_AD SPI_CS_AD SPI_MOSI_AD
component class U_LED_IND: D3 D4 D7 D8 R76 R77 R78 R80
net class CML_CAP_TO_CON: CMLout1_N CMLout1_P CMLout2_N CMLout2_P CMLout3_N CMLout3_P CMLout4_N CMLout4_P
net class SYNC: SYNC_N SYNC_P
net class CLK_IN_TO_CAP: CLKin1_N CLKin1_P
net class FPGA_CLK: O1_N O1_P O3_N O3_P
component class "U_Connector miniPCIe": P1
net class Dlugosc: CMLout1_ADC_N CMLout1_ADC_P CMLout2_ADC_N CMLout2_ADC_P CMLout3_ADC_N CMLout3_ADC_P CMLout4_ADC_N CMLout4_ADC_P
net class CLK_IN_LMK: LMK_CLKin1_N LMK_CLKin1_P
net class CLK_O: ADC_CLK9690_N ADC_CLK9690_P O1_N O1_P O3_N O3_P O8_N O8_P
component class U_Zegar: C171 C172 C173 C175 C176 C177 C178 C179 C183 C185 C186 C187 C188 C189 C222 C223 C224 C225 C226 C227 C228 J8 J11 R41 R79 R84 R89 R90 R91 R92 R94 R95 R96 R97 X1
component class U_Zasilanie: C40 C41 C42 C43 C45 C46 C47 C48 C49 C51 C52 C53 C54 C55 C56 C57 C58 C59 C60 C61 C62 C63 C64 C65 C66 C67 C68 C71 C72 C75 C76 C77 C78 FB4 FB5 FB6 FB7 FB11 FB13 FB14 FB30 FB31 FB32 R19 R37 R38 R42 R52 R53 R56 R57 R58 R59 R60 R61 R62 R63 R64 R65 R66 R67 R68 U7 U17 U18 U19 U20 U21
component class U_Zasilanie_LMK: C150 C151 C152 C153 C154 C155 C156 C157 C158 C159 C160 C161 C162 C163 C164 C165 C166 C167 C174 C180 C181 C182 C184 C190 C191 C192 C193 C194 C195 C196 C197 C198 C199 C200 C201 C202 C203 C204 C205 C206 C207 C208 C209 C210 C211 C212 C213 C214 C215 C216 C217 C218 FB15 FB16 FB17 FB18 FB19 FB20 FB22 FB23 FB24 FB25 FB26 FB27 FB28 FB29 U9
component class U_Zasilanie_ADC: C69 C73 C74 C79 C80 C81 C88 C89 C99 C100 C101 C102 C103 C104 C105 C106 C107 C108 C109 C110 C111 C113 C114 C115 C116 C117 C118 C119 C120 C121 C122 C123 C124 C125 C132 C133 C134 C136 C137 C138 C139 U1
component class U_Tor: FB1 FB2 FB3 U11
component class U_TorGnss: C25 C26 C27 C28 C29 C31 C32 C33 C256 C257 C258 C259 FL1 J7 J10 L1 L3 R46 R55 R102 U13 U14
component class "U_Tor antenowy": C21 C22 C24 C30 C34 C37 C70 C82 C83 C84 C85 C252 C253 D1 D2 D5 J1 J2 L2 L4 R31 R32 R40 R49 R81 R82 R85 R86 R87 R88 R93 R100 R103 R106 T1 T2 U5 U15
component class "U_Pomiar prądu i napięcia": C44 R15 R83 R111 R112 R129 R130 U3
component class U_Flash: C50 R20 R21 R27 R54 R69 R70 R71 R119 U6
component class U_ATT: C9 C10 C11 C12 C13 C14 R39 U2
component class U_ADC: C1 C2 C3 C4 C5 C6 C7 C8 C15 C16 C17 C18 C35 C36 C38 C39 R1 R2 R3 R4 R5 R6 R7 R8 R9 R10 R11 R12 R13 R14 R98 R104 R105 R113
component class Karta_Radiowa: FID1 FID2 FID3 FID4 FID5 FID6 H1 H2 H3 H4 H5
differential pair class Diff_100: ADC_CLK9690 Ain_2122_A AIn_2122_B Ain_2122A AIn_2122B AN_IN AN_IN_9690 CLKin0 CLKin0_1 CLKin0P CLKin1 CLKin1_1 CLKin1P CLKout1 CLKout1_C CLKout1_C2 CLKout2 CLKout2_C CLKout3 CLKout3_C CLKout4 CLKout4_C CLKout5 CLKout5_C CLKout5_C2 CLKout6 CLKout6O CLKout8 CLKout8_C CLKout9 CLKout9_C CLKout10 CLKout10_C CMLout1 CMLout1_ADC CMLout2 CMLout2_ADC CMLout3 CMLout3_ADC CMLout4 CMLout4_ADC CMLOUT_A CMLOUT_AC CMLOUT_B CMLOUT_BC LMK_CLKin0 LMK_CLKin1 LMK_OSC_IN O1 O1P O2 O3 O3P O4 O5 O5P O6 O6P O8 OSCIN PER3 SYNC VCXO_OUT
net class Single50: AN_IN_N AN_IN_P CLKin1_1_N CLKin1_1_P CLKout6_N CLKout6_P LMK_CLKin1_N LMK_CLKin1_P NetC1_1 NetC2_1 NetC3_2 NetC4_2 NetC5_1 NetC5_2 NetC6_2 NetC7_2 NetC8_2 NetC21_1 NetC21_2 NetC22_1 NetC22_2 NetC25_1 NetC25_2 NetC28_1 NetC28_2 NetC29_1 NetC29_2 NetC31_2 NetC32_1 NetC82_1 NetC82_2 NetC175_2 NetC176_1 NetC178_2 NetC179_1 NetC259_2 NetD1_6 NetD2_1 NetJ1_2 NetJ7_2 NetJ10_2 NetL1_2 NetR1_2 NetR9_1 NetR40_2 NetR55_2 NetR81_2 NetR100_2 Tor_RF_50 VCXO_OUT_N VCXO_OUT_P
net class Power_Line: 1V8@1A 1V25@0A5 1V25@1A 2V5@1A 3V3@0A5 3V3@1A_1 3V6_DCDC 12V +12 CTRL_VCXO GND GND_VCXO NetC41_2 NetC45_2 NetC64_2 NetC66_2 VC_CTRL VC_SUPP VCC_5_ATT VCC_AMP_5 VDD_CORE VDD_IO VDD_OSC VDD_PLL1 VDD_PLL2CORE VDD_PLL2OSC VDDO_1/2 VDDO_3/4 VDDO_5 VDDO_6 VDDO_7/8 VDDO_9/10
net class Diff_100: ADC_CLK9690_N ADC_CLK9690_P AN_IN_9690_N AN_IN_9690_P AN_IN_N AN_IN_P CLKin1_N CLKin1_P CLKout1_N CLKout1_P CLKout3_N CLKout3_P CLKout6_N CLKout6_P CLKout6O_N CLKout6O_P CLKout8_N CLKout8_P CLKout10_N CLKout10_P LMK_CLKin1_N LMK_CLKin1_P O1_N O1_P O3_N O3_P O8_N O8_P OSCIN_N OSCIN_P VCXO_OUT_N VCXO_OUT_P
net class CLKDisToC: CLKout1_N CLKout1_P CLKout3_N CLKout3_P CLKout6_N CLKout6_P CLKout8_N CLKout8_P CLKout10_N CLKout10_P
net class CLK_In2: LMK_CLKin1_N LMK_CLKin1_P
net class CLK_In1: CLKin1_N CLKin1_P
net class CLK_Out: CLKout1_N CLKout1_P CLKout3_N CLKout3_P CLKout6_N CLKout6_P CLKout8_N CLKout8_P CLKout10_N CLKout10_P
net class Ain: AN_IN_9690_N AN_IN_9690_P
net class ADC_CLK: ADC_CLK9690_N ADC_CLK9690_P O8_N O8_P
component class U_Komunikacja: C19 C20 C94 C95 C239 C240 C241 C242 C243 C244 R16 R17 R18 R22 R23 R24 R25 R26 R28 R29 R30 R33 R34 R35 R36 R43 R44 R45 R47 R48 R50 R51 R72 R73 R74 R75 R145 U4 U8 U10 U12 U16 U32 U33
differential pair AN_IN: +AN_IN_P -AN_IN_N
differential pair CLKout6O: +CLKout6O_P -CLKout6O_N
differential pair O3: +O3_P -O3_N
differential pair O1: +O1_P -O1_N
differential pair CLKout6: +CLKout6_P -CLKout6_N
differential pair O8: +O8_P -O8_N
differential pair CLKout10: +CLKout10_P -CLKout10_N
differential pair CLKout8: +CLKout8_P -CLKout8_N
differential pair CLKout3: +CLKout3_P -CLKout3_N
differential pair CMLout4_ADC: +CMLout4_ADC_P -CMLout4_ADC_N
differential pair CMLout3_ADC: +CMLout3_ADC_P -CMLout3_ADC_N
differential pair CMLout2_ADC: +CMLout2_ADC_P -CMLout2_ADC_N
differential pair CMLout1_ADC: +CMLout1_ADC_P -CMLout1_ADC_N
differential pair CLKin1: +CLKin1_P -CLKin1_N
differential pair SYNC: +SYNC_P -SYNC_N
differential pair OSCIN: +OSCIN_P -OSCIN_N
differential pair CMLout4: +CMLout4_P -CMLout4_N
differential pair CMLout3: +CMLout3_P -CMLout3_N
differential pair CMLout2: +CMLout2_P -CMLout2_N
differential pair CMLout1: +CMLout1_P -CMLout1_N
differential pair CLKin1_1: +CLKin1_1_P -CLKin1_1_N
differential pair AN_IN_9690: +AN_IN_9690_P -AN_IN_9690_N
differential pair ADC_CLK9690: +ADC_CLK9690_P -ADC_CLK9690_N
differential pair VCXO_OUT: +VCXO_OUT_P -VCXO_OUT_N
differential pair LMK_CLKin1: +LMK_CLKin1_P -LMK_CLKin1_N
differential pair CLKout1: +CLKout1_P -CLKout1_N

## Components (designator, comment, footprint, x,y, rotation, side; value= is the part's Value field where it differs from the comment)
C1 "4pF" "CAP 0201/0603 KK"#1 51.176,43.949 r180 bottom
C2 "1pF" "CAP 0201/0603 KK"#1 51.176,41.775 r180 bottom
C3 "100nF" "CAP 0201/0603 KK"#1 51.42,50.308 r270 bottom
C4 "100nF" "CAP 0201/0603 KK"#1 51.825,46.8 r90 top
C5 "1pF" "CAP 0201/0603 KK"#1 51.798,45.294 r180 top
C6 "100nF" "CAP 0201/0603 KK"#1 52.195,50.308 r270 bottom
C7 "4pF" "CAP 0201/0603 KK"#1 52.466,43.949 r180 bottom
C8 "1pF" "CAP 0201/0603 KK"#1 52.466,41.775 r180 bottom
C9 "100nF" "CAP 0201/0603 KK"#1 51.279,92.223 r90 bottom
C10 "10uF" "CAP 0402/1005 RF KK" 52.304,92.223 r90 bottom
C11 "330pF" "CAP 0402/1005 RF KK" 33.483,75.348 r180 bottom
C12 "330pF" "CAP 0402/1005 RF KK" 33.459,74.286 r180 bottom
C13 "330pF" "CAP 0402/1005 RF KK" 33.459,73.256 r180 bottom
C14 "330pF" "CAP 0402/1005 RF KK" 33.459,72.221 r180 bottom
C15 "100nF" "CAP 0201/0603 KK"#1 43.516,7.581 r270 bottom
C16 "100nF" "CAP 0201/0603 KK"#1 42.884,7.581 r270 bottom
C17 "100nF" "CAP 0201/0603 KK"#1 41.116,7.581 r270 bottom
C18 "100nF" "CAP 0201/0603 KK"#1 40.484,7.581 r270 bottom
C19 "100nF" "CAP 0201/0603 KK"#1 55.895,7.128 r270 top
C20 "100nF" "CAP 0201/0603 KK"#1 56.49,9.911 r180 top
C21 "100pF" "CAP 0201/0603 KK"#1 22.24,77.193 r0 bottom
C22 "100pF" "CAP 0201/0603 KK"#1 32.672,63.12 r0 bottom
C24 "2.2uF" "CAP 0402/1005 RF KK" 20.949,69.134 r270 top
C25 "33pF" "CAP 0402/1005 RF KK" 37.302,76.677 r90 bottom
C26 "2.2uF" "CAP 0603/1608 RF" 62.05,87.894 r180 bottom
C27 "100nF" "CAP 0201/0603 KK"#1 61.25,89.98 r180 bottom
C28 "33pF" "CAP 0402/1005 RF KK" 54.06,77.75 r180 bottom
C29 "33pF" "CAP 0402/1005 RF KK" 47.538,78.151 r180 bottom
C30 "560pF" "CAP 0402/1005 RF KK" 21.248,72.38 r180 bottom
C31 "470pF" "CAP 0603/1608 RF" 54.585,68.687 r90 bottom
C32 "33pF" "CAP 0402/1005 RF KK" 58.244,66.642 r270 bottom
C33 "470pF" "CAP 0603/1608 RF" 53.005,68.718 r90 bottom
C34 "100pF" "CAP 0402/1005 RF KK" 23.56,68.983 r180 top
C35 "100nF" "CAP 0201/0603 KK"#1 38.716,7.581 r270 bottom
C36 "100nF" "CAP 0201/0603 KK"#1 38.084,7.581 r270 bottom
C37 "4.7uF" "CAP 0603/1608 RF" 22.15,62.3 r180 top
C38 "100nF" "CAP 0201/0603 KK"#1 36.319,7.581 r270 bottom
C39 "100nF" "CAP 0201/0603 KK"#1 35.684,7.581 r270 bottom
C40 "10uF" "CAP 0603/1608 RF" 11.923,41.648 r0 top
C41 "100nF" "CAP 0201/0603 KK"#2 17.991,44.282 r0 top
C42 "10uF" "CAP 0603/1608 RF" 19.584,44.007 r270 top
C43 "10uF" "CAP 0603/1608 RF" 11.923,40.123 r0 top
C44 "100nF" "CAP 0201/0603 KK"#1 3.752,8.195 r90 top
C45 "100nF" "CAP 0201/0603 KK"#2 18.016,38.657 r0 top
C46 "10uF" "CAP 0603/1608 RF" 19.532,38.718 r90 top
C47 "1uF" "CAP 0402/1005 RF KK" 14.916,45.843 r90 top
C48 "4.7uF" "CAP 0603/1608 RF" 10.233,7.319 r90 top
C49 "4.7uF" "CAP 0603/1608 RF" 15.572,17.956 r180 top
C50 "100nF" "CAP 0201/0603 KK"#1 61.449,14.306 r0 top
C51 "1uF" "CAP 0402/1005 RF KK" 14.205,37.632 r270 top
C52 "10uF" "CAP 0603/1608 RF" 6.63,26.066 r0 top
C53 "100nF" "CAP 0201/0603 KK"#2 14.599,20.784 r0 top
C54 "10uF" "CAP 0603/1608 RF" 15.507,23.787 r270 top
C55 "10uF" "CAP 0603/1608 RF" 6.674,23.65 r0 top
C56 "100nF" "CAP 0201/0603 KK"#2 14.017,29.137 r0 top
C57 "10uF" "CAP 0603/1608 RF" 22.098,26.148 r90 top
C58 "1uF" "CAP 0402/1005 RF KK" 9.942,29.137 r90 top
C59 "1uF" "CAP 0402/1005 RF KK" 11.117,20.976 r0 top
C60 "1uF" "CAP 0402/1005 RF KK" 4.206,62.315 r90 top
C61 "2.2uF" "CAP 0402/1005 RF KK" 10.304,61.815 r90 top
C62 "1uF" "CAP 0402/1005 RF KK" 10.487,33.98 r0 top
C63 "100pF" "CAP 0402/1005 RF KK" 7.255,59.049 r0 top
C64 "1uF" "CAP 0402/1005 RF KK" 12.887,31.509 r0 top
C65 "1uF" "CAP 0402/1005 RF KK" 20.973,48.019 r0 top
C66 "1uF" "CAP 0402/1005 RF KK" 24.106,46.876 r0 top
C67 "4.7uF" "CAP 0402/1005 RF KK" 20.908,38.657 r90 top
C68 "4.7uF" "CAP 0402/1005 RF KK" 22.227,36.658 r90 top
C69 "100nF" "CAP 0201/0603 KK"#1 54.753,37.287 r90 top
C70 "1uF" "CAP 0402/1005 RF KK" 22.13,60.526 r180 top
C71 "4.7uF" "CAP 0402/1005 RF KK" 20.831,44.043 r270 top
C72 "4.7uF" "CAP 0402/1005 RF KK" 23.659,42.911 r90 top
C73 "10uF" "CAP 0603/1608 RF" 59.553,27.541 r180 top
C74 "10uF" "CAP 0603/1608 RF" 60.875,34.65 r180 top
C75 "4.7uF" "CAP 0402/1005 RF KK" 12.887,30.297 r0 top
C76 "4.7uF" "CAP 0402/1005 RF KK" 19.007,32.182 r270 top
C77 "4.7uF" "CAP 0402/1005 RF KK" 24.121,45.709 r0 top
C78 "4.7uF" "CAP 0402/1005 RF KK" 28.581,46.343 r270 top
C79 "10uF" "CAP 0603/1608 RF" 60.875,33.2 r180 top
C80 "10uF" "CAP 0603/1608 RF" 46.029,31.05 r0 top
C81 "10uF" "CAP 0603/1608 RF" 46.142,34.738 r0 top
C82 "100pF" "CAP 0201/0603 KK"#1 39.658,65.735 r270 bottom
C83 "100pF" "CAP 0201/0603 KK"#1 33.679,87.165 r90 bottom
C84 "100nF" "CAP 0201/0603 KK"#1 -3.916,93.53 r90 bottom
C85 "100nF" "CAP 0201/0603 KK"#1 42.444,73.198 r180 bottom
C88 "100nF" "CAP 0201/0603 KK"#1 59.3,28.787 r180 top
C89 "100nF" "CAP 0201/0603 KK"#1 60.51,31.925 r180 top
C94 "100nF" "CAP 0201/0603 KK"#1 36.458,19.817 r90 top
C95 "100nF" "CAP 0201/0603 KK"#1 45.864,23.857 r0 top
C99 "100nF" "CAP 0201/0603 KK"#1 47.096,29.656 r0 bottom
C100 "100nF" "CAP 0201/0603 KK"#1 46.977,36.924 r0 bottom
C101 "100nF" "CAP 0201/0603 KK"#1 47.107,28.893 r0 bottom
C102 "100nF" "CAP 0201/0603 KK"#1 46.977,36.178 r0 bottom
C103 "100nF" "CAP 0201/0603 KK"#1 49.204,39.213 r270 bottom
C104 "100nF" "CAP 0201/0603 KK"#1 54.483,39.983 r270 bottom
C105 "100nF" "CAP 0201/0603 KK"#1 55.258,39.983 r270 bottom
C106 "100nF" "CAP 0201/0603 KK"#1 56.033,39.983 r270 bottom
C107 "100nF" "CAP 0201/0603 KK"#1 56.808,39.983 r270 bottom
C108 "100nF" "CAP 0201/0603 KK"#1 52.938,26.436 r90 bottom
C109 "100nF" "CAP 0201/0603 KK"#1 53.697,26.432 r90 bottom
C110 "100nF" "CAP 0201/0603 KK"#1 54.459,26.429 r90 bottom
C111 "100nF" "CAP 0201/0603 KK"#1 50.652,26.436 r90 bottom
C113 "100nF" "CAP 0201/0603 KK"#1 46.977,37.669 r0 bottom
C114 "100nF" "CAP 0201/0603 KK"#1 47.698,39.212 r270 bottom
C115 "100nF" "CAP 0201/0603 KK"#1 48.454,39.208 r270 bottom
C116 "100nF" "CAP 0201/0603 KK"#1 46.977,35.432 r0 bottom
C117 "100nF" "CAP 0201/0603 KK"#1 47.117,28.133 r0 bottom
C118 "100nF" "CAP 0201/0603 KK"#1 47.107,30.265 r0 bottom
C119 "100nF" "CAP 0201/0603 KK"#1 49.887,26.432 r90 bottom
C120 "100nF" "CAP 0201/0603 KK"#1 49.116,26.432 r90 bottom
C121 "100nF" "CAP 0201/0603 KK"#1 48.868,32.275 r180 top
C122 "100nF" "CAP 0201/0603 KK"#1 52.183,26.441 r90 bottom
C123 "100nF" "CAP 0201/0603 KK"#1 51.414,26.429 r90 bottom
C124 "100nF" "CAP 0201/0603 KK"#1 53.76,39.106 r270 bottom
C125 "100nF" "CAP 0201/0603 KK"#1 49.95,39.22 r270 bottom
C132 "100nF" "CAP 0201/0603 KK"#1 57.593,38.4 r90 top
C133 "100nF" "CAP 0201/0603 KK"#1 60.25,39.425 r270 top
C134 "100nF" "CAP 0201/0603 KK"#1 18.783,29.57 r90 top
C136 "100nF" "CAP 0201/0603 KK"#1 58.112,39.968 r180 bottom
C137 "100nF" "CAP 0201/0603 KK"#1 55.221,26.436 r90 bottom
C138 "100nF" "CAP 0201/0603 KK"#1 45.656,33.609 r0 top
C139 "100nF" "CAP 0201/0603 KK"#1 43.641,30.643 r0 top
C150 "100nF" "CAP 0201/0603 KK"#1 30.063,19.817 r90 top
C151 "100nF" "CAP 0201/0603 KK"#1 31.342,19.817 r90 top
C152 "100nF" "CAP 0201/0603 KK"#1 29.195,22.311 r90 top
C153 "10uF" "CAP 0402/1005 RF KK" 32.024,23.362 r90 top
C154 "100nF" "CAP 0201/0603 KK"#1 34.529,38.4 r270 top
C155 "100nF" "CAP 0201/0603 KK"#1 35.681,39.141 r0 top
C156 "100nF" "CAP 0201/0603 KK"#1 35.841,35.722 r0 top
C157 "10uF" "CAP 0402/1005 RF KK" 34.546,36.507 r90 top
C158 "100nF" "CAP 0201/0603 KK"#1 30.395,39.451 r270 top
C159 "100nF" "CAP 0201/0603 KK"#1 28.624,38.372 r90 top
C160 "100nF" "CAP 0201/0603 KK"#1 30.582,35.379 r180 top
C161 "10uF" "CAP 0402/1005 RF KK" 28.624,36.613 r270 top
C162 "100nF" "CAP 0201/0603 KK"#1 41.82,33.517 r90 top
C163 "100nF" "CAP 0201/0603 KK"#1 40.919,32.479 r180 top
C164 "100nF" "CAP 0201/0603 KK"#1 38.272,33.517 r90 top
C165 "10uF" "CAP 0402/1005 RF KK" 38.586,34.881 r180 top
C166 "100nF" "CAP 0201/0603 KK"#1 32.621,19.817 r90 top
C167 "100nF" "CAP 0201/0603 KK"#1 33.9,19.817 r90 top
C171 "10uF" "CAP 0402/1005 RF KK" 37.108,35.395 r90 bottom
C172 "10uF" "CAP 0402/1005 RF KK" 32.227,22.962 r180 bottom
C173 "10uF" "CAP 0402/1005 RF KK" 34.552,23.728 r270 bottom
C174 "100nF" "CAP 0201/0603 KK"#1 35.046,24.851 r180 top
C175 "100nF" "CAP 0201/0603 KK"#1 34.681,44.161 r270 bottom
C176 "100nF" "CAP 0201/0603 KK"#1 34.706,39.803 r270 bottom
C177 "100pF" "CAP 0402/1005 RF KK" 32.682,52.881 r180 bottom
C178 "100nF" "CAP 0201/0603 KK"#1 33.928,44.161 r270 bottom
C179 "100nF" "CAP 0201/0603 KK"#1 33.961,39.803 r270 bottom
C180 "10uF" "CAP 0402/1005 RF KK" 34.629,23.399 r90 top
C181 "100nF" "CAP 0201/0603 KK"#1 24.701,26.5 r90 top
C182 "100nF" "CAP 0201/0603 KK"#1 21.018,32.082 r0 top
C183 "100nF" "CAP 0201/0603 KK"#1 44.258,33.693 r0 bottom
C184 "100nF" "CAP 0201/0603 KK"#1 27.199,28.487 r90 top
C185 "100nF" "CAP 0201/0603 KK"#1 44.258,34.389 r0 bottom
C186 "100nF" "CAP 0201/0603 KK"#1 44.258,30.83 r0 bottom
C187 "100nF" "CAP 0201/0603 KK"#1 44.258,31.534 r0 bottom
C188 "100nF" "CAP 0201/0603 KK"#1 45.93,6.543 r270 bottom
C189 "100nF" "CAP 0201/0603 KK"#1 45.306,6.543 r270 bottom
C190 "10uF" "CAP 0402/1005 RF KK" 26.298,27.22 r180 top
C191 "100nF" "CAP 0201/0603 KK"#1 41.138,30.038 r180 top
C192 "100nF" "CAP 0201/0603 KK"#1 41.874,31.182 r270 top
C193 "100nF" "CAP 0201/0603 KK"#1 38.303,31.209 r270 top
C194 "10uF" "CAP 0402/1005 RF KK" 39.138,32.457 r0 top
C195 "100nF" "CAP 0201/0603 KK"#1 35.179,19.817 r90 top
C196 "100nF" "CAP 0201/0603 KK"#1 37.737,19.817 r90 top
C197 "100nF" "CAP 0201/0603 KK"#1 38.194,23.279 r90 top
C198 "10uF" "CAP 0402/1005 RF KK" 37.237,23.439 r90 top
C199 "100nF" "CAP 0201/0603 KK"#1 23.285,26.5 r90 top
C200 "100nF" "CAP 0201/0603 KK"#1 21.018,33.188 r0 top
C201 "100nF" "CAP 0201/0603 KK"#1 27.191,31.027 r90 top
C202 "10uF" "CAP 0402/1005 RF KK" 26.298,29.776 r180 top
C203 "100nF" "CAP 0201/0603 KK"#1 41.943,28.787 r270 top
C204 "100nF" "CAP 0201/0603 KK"#1 40.789,27.541 r0 top
C205 "100nF" "CAP 0201/0603 KK"#1 39.435,27.541 r180 top
C206 "10uF" "CAP 0402/1005 RF KK" 38.952,29.972 r0 top
C207 "100nF" "CAP 0201/0603 KK"#1 39.997,44.676 r180 bottom
C208 "100nF" "CAP 0201/0603 KK"#1 39.976,45.481 r180 bottom
C209 "100nF" "CAP 0201/0603 KK"#1 37.639,48.614 r270 bottom
C210 "10uF" "CAP 0402/1005 RF KK" 38.664,48.549 r270 bottom
C211 "100nF" "CAP 0201/0603 KK"#1 23.499,34.747 r270 top
C212 "100nF" "CAP 0201/0603 KK"#1 21.998,34.747 r270 top
C213 "100nF" "CAP 0201/0603 KK"#1 27.465,33.461 r90 top
C214 "10uF" "CAP 0402/1005 RF KK" 26.263,32.21 r180 top
C215 "100nF" "CAP 0201/0603 KK"#1 32.029,38.828 r270 top
C216 "100nF" "CAP 0201/0603 KK"#1 33.321,39.141 r180 top
C217 "100nF" "CAP 0201/0603 KK"#1 33.274,35.562 r180 top
C218 "10uF" "CAP 0402/1005 RF KK" 32.056,36.55 r90 top
C222 "4.7uF" "CAP 0603/1608 RF" 26.089,49.179 r180 bottom
C223 "100nF" "CAP 0201/0603 KK"#1 42.784,48.35 r90 top
C224 "100nF" "CAP 0201/0603 KK"#1 42.034,48.35 r90 top
C225 "100nF" "CAP 0201/0603 KK"#1 29.468,35.22 r270 bottom
C226 "100nF" "CAP 0201/0603 KK"#1 30.187,35.22 r270 bottom
C227 "100nF" "CAP 0201/0603 KK"#1 41.564,6.933 r270 top
C228 "100nF" "CAP 0201/0603 KK"#1 40.85,6.933 r270 top
C239 "100nF" "CAP 0201/0603 KK"#1 31.186,41.763 r0 top
C240 "100nF" "CAP 0201/0603 KK"#1 26.262,41.996 r270 top
C241 "1uF" "CAP 0402/1005 RF KK" 84.425,61.988 r90 top
C242 "1uF" "CAP 0402/1005 RF KK" 13.44,57.838 r0 top
C243 "100nF" "CAP 0201/0603 KK"#1 48.612,7.416 r270 top
C244 "100nF" "CAP 0201/0603 KK"#1 48.075,9.342 r180 top
C252 "100pF" "CAP 0201/0603 KK"#1 23.56,76.837 r90 bottom
C253 "100pF" "CAP 0201/0603 KK"#1 34.022,63.38 r270 bottom
C256 "100pF" "CAP 0201/0603 KK"#1 36.927,78.291 r0 bottom
C257 "100pF" "CAP 0201/0603 KK"#1 56.075,77.125 r90 bottom
C258 "100pF" "CAP 0201/0603 KK"#1 62.45,86.61 r180 bottom
C259 "100pF" "CAP 0201/0603 KK"#1 56.235,72.942 r0 bottom
D1 "MADP-011029-14150T" ODS-1415 25.89,77.647 r0 bottom
D2 "CLA4611-085LF" CLA4611-085LF 27.39,74.475 r270 bottom
D3 "LTST-C190GKT" "LED 0603/1608 GREEN" 27.813,52.693 r180 top
D4 "LTST-C190GKT" "LED 0603/1608 GREEN" 11.332,59.659 r180 top
D5 "CLA4603-085LF" CLA4611-085LF 27.39,67.833 r270 bottom
D7 "LTST-C190GKT" "LED 0603/1608 GREEN" 2.669,14.353 r90 top
D8 "LTST-C190GKT" "LED 0603/1608 GREEN" 19.657,25.411 r0 top
FB1 "120R" "FER 0402/1005 KK" 49.65,76.585 r90 top
FB2 "120R" "FER 0402/1005 KK" 39.367,69.907 r180 bottom
FB3 "120R" "FER 0402/1005 KK" 51.534,68.903 r90 bottom
FB4 "120R" "FER 0603/1608 KK" 26.564,45.806 r0 top
FB5 "10R" "FER 0402/1005 KK" 12.567,7.075 r90 top
FB6 "10R" "FER 0402/1005 KK" 14.997,7.075 r90 top
FB7 "120R" "FER 0603/1608 KK" 22.448,39.141 r270 top
FB11 "10R" "FER 0402/1005 KK" 39.658,42.571 r180 top
FB13 "10R" "FER 0402/1005 KK" 16.211,7.075 r90 top
FB14 "10R" "FER 0402/1005 KK" 13.782,7.075 r90 top
FB15 "220R" "FER 0603/1608 KK" 30.726,22.404 r90 top
FB16 "220R" "FER 0603/1608 KK" 35.866,37.413 r270 top
FB17 "220R" "FER 0603/1608 KK" 30.061,37.415 r270 top
FB18 "220R" "FER 0603/1608 KK" 40.02,33.647 r180 top
FB19 "220R" "FER 0603/1608 KK" 33.336,22.404 r90 top
FB20 "220R" "FER 0603/1608 KK" 25.306,28.514 r0 top
FB22 "220R" "FER 0603/1608 KK" 40.02,31.248 r180 top
FB23 "220R" "FER 0603/1608 KK" 35.925,22.404 r90 top
FB24 "220R" "FER 0603/1608 KK" 25.388,30.983 r0 top
FB25 "220R" "FER 0603/1608 KK" 40.073,28.806 r180 top
FB26 "220R" "FER 0603/1608 KK" 27.39,45.883 r90 bottom
FB27 "220R" "FER 0603/1608 KK" 25.398,33.48 r0 top
FB28 "220R" "FER 0603/1608 KK" 33.279,37.423 r270 top
FB29 "120R" "FER 0603/1608 KK" 38.545,50.86 r0 bottom
FB30 "10R" "FER 0402/1005 KK" 17.426,7.075 r90 top
FB31 "120R" "FER 0603/1608 KK" 22.275,43.136 r90 top
FB32 "120R" "FER 0603/1608 KK" 16.13,30.792 r0 top
FID1 "Fiducials" Fiducials 38.988,25.127 r90 top
FID2 "Fiducials" Fiducials 39.304,57.484 r90 top
FID3 "Fiducials" Fiducials 61.609,4.905 r90 top
FID4 "Fiducials" Fiducials 66.275,38.173 r90 top
FID5 "Fiducials" Fiducials 72.282,2.555 r90 top
FID6 "Fiducials" Fiducials 4.399,20.783 r90 top
FL1 "TA1954A" TA1954A 51.074,78.309 r315 bottom
H1 "6.5x0.8x1.27mm" 36900000 16.416,61.365 r180 bottom
H2 "6.5x0.8x1.27mm" 36900000 53.405,81.075 r180 bottom
H3 "6.5x0.8x1.27mm" 36900000 62.05,66.275 r270 bottom
H4 "6.5x0.8x1.27mm" 36900000 10.375,75.275 r270 bottom
H5 "6.5x0.8x1.27mm" 36900000 15.825,81.075 r0 bottom
H6 "6.5x0.8x1.27mm" 36900000 62.05,75.475 r270 bottom (schematic designator H2)
H7 "6.5x0.8x1.27mm" 36900000 43.975,55.1 r180 bottom (schematic designator H2)
J1 "1909763-1" TECO-1909763-1_V 43.221,66.944 r180 top
J2 "32K101-400L5" ROS-32K101-400L5_V 5.658,67.694 r90 top
J7 "1909763-1" TECO-1909763-1_V 44.685,77.75 r90 top
J8 "1909763-1" TECO-1909763-1_V 44.685,53.391 r270 top
J10 "1909763-1" TECO-1909763-1_V 58.175,59.25 r270 top
J11 "1909763-1" TECO-1909763-1_V 40.157,53.391 r90 top
L1 "8.2nH" "IND 0402/1005 RF WW" 39.202,79.503 r0 bottom
L2 "2.7nH, 0.64A" WE-KI_0402 20.723,76.78 r270 bottom
L3 "20nH, 0.42A" WE-KI_0402 56.083,71.718 r0 bottom
L4 "43nH" "IND 0402/1005 RF WW" 30.923,63.56 r270 bottom
P1 "PCIeMini-CN-2S-M-R52" PCIeMini-GF-2D-800-1K-S52 35,1.4 r0 top locked
R1 "10R" "RES 0201/0603" 51.42,48.898 r270 bottom
R2 "0mR" "RES 0402/1005 RF KK" 51.259,46.158 r270 bottom
R3 "10R" "RES 0201/0603" 51.436,42.831 r270 bottom
R4 "0mR" "RES 0402/1005 RF KK" 51.279,40.341 r270 bottom
R5 "49.9R" "RES 0201/0603" 51.05,47.729 r0 bottom
R6 "10R" "RES 0201/0603" 51.111,44.676 r0 bottom
R7 "49.9R" "RES 0201/0603" 51.798,51.452 r180 bottom
R8 "10R" "RES 0201/0603" 52.531,44.676 r0 bottom
R9 "49.9R" "RES 0201/0603" 52.554,47.724 r0 bottom
R10 "10R" "RES 0201/0603" 52.195,48.898 r270 bottom
R11 "0mR" "RES 0402/1005 RF KK" 52.343,46.158 r270 bottom
R12 "10R" "RES 0201/0603" 52.206,42.831 r270 bottom
R13 "0mR" "RES 0402/1005 RF KK" 52.349,40.341 r270 bottom
R14 "100R" "RES 0201/0603" 45.614,31.209 r270 bottom
R15 "FCSL110R005FER" FCSL110R005FERCT-ND 14.174,6.828 r90 bottom
R16 "1kR" "RES 0402/1005 RF KK" 32.349,8.081 r0 top
R17 "1kR" "RES 0402/1005 RF KK" 32.349,6.705 r180 top
R18 "1kR" "RES 0402/1005 RF KK" 61.309,8.253 r0 top
R19 "75kR" "RES 0402/1005 RF KK" 16.446,32.582 r180 top
R20 "0mR" "RES 0402/1005 RF KK" 64.473,19.175 r0 top
R21 "10kR" "RES 0402/1005 RF KK" 66.275,8.108 r90 top
R22 "1kR" "RES 0402/1005 RF KK" 76.204,67.953 r180 top
R23 "1kR" "RES 0402/1005 RF KK" 76.204,69.187 r180 top
R24 "1kR" "RES 0402/1005 RF KK" 76.204,70.397 r180 top
R25 "0mR" "RES 0402/1005 RF KK" 78.754,69.187 r180 top
R26 "0mR" "RES 0402/1005 RF KK" 78.754,70.397 r180 top
R27 "10kR" "RES 0402/1005 RF KK" 64.473,17.943 r180 top
R28 "0mR" "RES 0402/1005 RF KK" 78.754,67.953 r180 top
R29 "1kR" "RES 0402/1005 RF KK" 58.375,11.492 r180 top
R30 "1kR" "RES 0402/1005 RF KK" 5.79,52.393 r270 bottom
R31 "68R" "RES 0402/1005 RF KK" 20.723,74.303 r90 bottom
R32 "1kR" "RES 0402/1005 RF KK" 16.763,63.314 r0 top
R33 "1kR" "RES 0402/1005 RF KK" 8.275,52.393 r270 bottom
R34 "1kR" "RES 0402/1005 RF KK" 7.031,52.393 r270 bottom
R35 "0mR" "RES 0402/1005 RF KK" 5.79,55.42 r270 bottom
R36 "20kR" "RES 0402/1005 RF KK" 60.304,15.728 r180 top
R37 "100kR" "RES 0402/1005 RF KK" 9.431,47.461 r0 top
R38 "100kR" "RES 0402/1005 RF KK" 9.443,46.307 r0 top
R39 "1kR" "RES 0402/1005 RF KK" 56.84,93.155 r270 bottom
R40 "4.99R" "RES 0402/1005 RF KK" 35.727,63.12 r0 bottom
R41 "51R" "RES 0402/1005 RF KK" 43.496,47.139 r180 top
R42 "100kR" "RES 0402/1005 RF KK" 9.443,45.141 r0 top
R43 "1kR" "RES 0402/1005 RF KK" 32.509,10.29 r270 top
R44 "1kR" "RES 0402/1005 RF KK" 34.221,10.374 r270 top
R45 "0mR" "RES 0402/1005 RF KK" 7.031,55.42 r270 bottom
R46 "22R" "RES 0402/1005 RF KK" 53.505,71.718 r180 bottom
R47 "0mR" "RES 0402/1005 RF KK" 8.275,55.42 r270 bottom
R48 "10kR" "RES 0402/1005 RF KK" 47.201,6.893 r90 top
R49 "10kR" "RES 0402/1005 RF KK" 19.166,65.625 r90 top
R50 "0mR" "RES 0402/1005 RF KK" 29.7,8.088 r0 top
R51 "0mR" "RES 0402/1005 RF KK" 29.7,6.705 r0 top
R52 "100kR" "RES 0402/1005 RF KK" 9.444,43.984 r0 top
R53 "49.9kR" "RES 0402/1005 RF KK" 16.446,33.871 r0 top
R54 "10kR" "RES 0402/1005 RF KK" 63.656,8.108 r90 top
R55 "0mR" "RES 0402/1005 RF - 3-PADS"#1 41.52,79.503 r0 bottom
R56 "82.5kR" "RES 0402/1005 RF KK" 25.781,47.834 r270 top
R57 "5.62kR" "RES 0402/1005 RF KK" 17.791,45.332 r0 top
R58 "10kR" "RES 0402/1005 RF KK" 16.116,45.807 r270 top
R59 "2.43kR" "RES 0402/1005 RF KK" 17.991,37.632 r0 top
R60 "1.15kR" "RES 0402/1005 RF KK" 16.314,37.137 r90 top
R61 "11.3kR" "RES 0402/1005 RF KK" 3.827,17.956 r90 top
R62 "0mR" "RES 0402/1005 RF KK" 3.842,11.385 r270 top
R63 "3.16kR" "RES 0402/1005 RF KK" 3.827,15.681 r90 top
R64 "3.57kR" "RES 0402/1005 RF KK" 14.781,21.734 r0 top
R65 "1.15kR" "RES 0402/1005 RF KK" 13.101,21.093 r90 top
R66 "1.87kR" "RES 0402/1005 RF KK" 13.932,28.173 r0 top
R67 "1.5kR" "RES 0402/1005 RF KK" 11.123,29.33 r270 top
R68 "14.7kR" "RES 0402/1005 RF KK" 25.781,50.184 r270 top
R69 "10kR" "RES 0402/1005 RF KK" 64.973,8.108 r90 top
R70 "0mR" "RES 0402/1005 RF KK" 63.656,5.695 r90 top
R71 "0mR" "RES 0402/1005 RF KK" 64.973,5.695 r90 top
R72 "10kR" "RES 0402/1005 RF KK" 28.05,9.919 r90 top
R73 "10kR" "RES 0402/1005 RF KK" 52.033,11.832 r90 top
R74 "0mR" "RES 0402/1005 RF KK" 47.393,25.724 r180 top
R75 "0mR" "RES 0402/1005 RF KK" 50.955,13.019 r270 top
R76 "1kR" "RES 0402/1005 RF KK" 11.724,61.815 r90 top
R77 "560R" "RES 0402/1005 RF KK" 29.801,50.58 r270 top
R78 "560R" "RES 0402/1005 RF KK" 17.606,23.925 r270 top
R79 "51R" "RES 0402/1005 RF KK" 35.366,40.937 r0 bottom
R80 "1kR" "RES 0402/1005 RF KK" 2.664,11.385 r270 top
R81 "4.99R" "RES 0402/1005 RF KK" 37.302,67.993 r90 bottom
R82 "" "RES 0402/1005 RF - 3-PADS"#2 44.458,87.255 r180 bottom
R83 "10kR" "RES 0402/1005 RF KK" 2.172,8.462 r0 top
R84 "51R" "RES 0402/1005 RF KK" 33.233,40.937 r0 bottom
R85 "" "RES 0402/1005 RF - 3-PADS"#2 49.686,71.006 r270 bottom
R86 "220R" "RES 0402/1005 RF KK" 37.802,65.475 r0 bottom
R87 "61.9R" "RES 0402/1005 RF KK" 41.345,65.475 r180 bottom
R88 "49.9R" "RES 0402/1005 RF KK" 41.782,67.718 r270 bottom
R89 "0mR" "RES 0402/1005 RF KK" 27.969,49.679 r90 bottom
R90 "0mR" "RES 0402/1005 RF KK" 34.876,42.452 r270 bottom
R91 "0mR" "RES 0402/1005 RF KK" 33.733,42.454 r270 bottom
R92 "100R" "RES 0402/1005 RF KK" 42.407,45.916 r180 top
R93 "40.2kR" "RES 0402/1005 RF KK" 46.913,68.975 r270 bottom
R94 "0mR" "RES 0402/1005 RF KK" 25.613,11.644 r90 top
R95 "100R" "RES 0402/1005 RF KK" 25.207,13.519 r180 top
R96 "0mR" "RES 0402/1005 RF KK" 24.784,11.645 r90 top
R97 "51R" "RES 0402/1005 RF KK" 41.318,47.138 r0 top
R98 "" "RES 0402/1005 RF KK" 43.209,6.485 r0 bottom
R100 "0mR" "RES 0402/1005 RF KK" 42.444,70.681 r0 bottom
R102 "0mR" "RES 0402/1005 RF - 3-PADS"#1 58.244,68.962 r90 bottom
R103 "1kR" "RES 0402/1005 RF KK" 48.225,68.962 r270 bottom
R104 "" "RES 0402/1005 RF KK" 40.81,6.493 r0 bottom
R105 "" "RES 0402/1005 RF KK" 38.411,6.493 r0 bottom
R106 "4.02kR" "RES 0402/1005 RF KK" 42.444,71.964 r0 bottom
R111 "1kR" "RES 0402/1005 RF KK" 21.333,8.944 r270 top
R112 "1kR" "RES 0402/1005 RF KK" 22.691,8.944 r270 top
R113 "" "RES 0402/1005 RF KK" 36.008,6.493 r0 bottom
R119 "0mR" "RES 0402/1005 RF KK" 66.275,5.695 r90 top
R129 "0mR" "RES 0402/1005 RF KK" 21.333,6.425 r270 top
R130 "0mR" "RES 0402/1005 RF KK" 22.691,6.425 r270 top
R145 "1kR" "RES 0402/1005 RF KK" 53.837,8.553 r0 top
T1 "SI2342DS-T1-GE3" SI2342DS-T1-GE3 16.252,71.068 r90 bottom
T2 "SI2342DS-T1-GE3" SI2342DS-T1-GE3 16.252,66.594 r90 bottom
U1 "AD9690" AD9690 53.308,33.025 r270 bottom
U2 "HMC472ALP4E" HMC472ALP4E 37.552,73.25 r90 bottom
U3 "INA226AIDGSR" INA226 4.805,7.263 r0 bottom
U4 "MCP23017T-E/ML" MCP23017/MCP23S17#1 78.175,61.988 r180 top
U5 "AP2210K-5.0TRG1" AP2210K-3.3TRG1 21.83,65.735 r90 top
U6 "24LC32AT-I/SN" "8-SOIC 3.9" 65.64,13.275 r90 top
U7 "TPS7A8801RTJT" TPS7A88 15.97,41.423 r0 top
U8 "SN74AXC4T774RSVR" 16-UGFN 50.77,8.358 r90 top
U9 "LMK04610RTQR" LMK04610 32.831,29.7 r90 bottom locked
U10 "SN74AXC4T774RSVR" 16-UGFN 58.103,8.053 r90 top
U11 "1600BL15B100E" 1600BL15B100 51.798,53.364 r180 bottom
U12 "TXB0101DRLT" "6-SOT DRL0006A" 45.02,25.127 r180 top
U13 "BGA524N6" TSNP-6-10-FP 44.27,78.532 r180 bottom
U14 "BGA616" GPS05605 58.35,75.475 r225 bottom
U15 "ADL5910ACPZN-R7" ADL5910 46.089,72.375 r45 bottom
U16 "PCA9306DQER" PCA9306 30.851,10.444 r90 top
U17 "4-18Vin, 3Aout" LGA-16EP 9.68,14.653 r90 top
U18 "TPS7A8801RTJT" TPS7A88 11.742,24.987 r0 top
U19 "ADP125ACPZ-R7" ADP124_125 13.117,33.369 r180 top
U20 "AP2210K-5.0TRG1" AP2210K-3.3TRG1 7.458,61.462 r0 top
U21 "ADP125ACPZ-R7" ADP124_125 23.731,48.759 r180 top
U32 "TXB0304RSVR" TXB0304 28.724,42.336 r270 top
U33 "MCP23017T-E/ML" MCP23017/MCP23S17#2 14.482,53.079 r270 top
X1 "VG-4513CA122.8800M-GFCT3" VG-4513CA 32.986,48.76 r270 bottom

## Footprints (in the part's own frame and the unit in brackets; to place one, negate y for a bottom-side part, rotate by r counter-clockwise, add the part's x,y. Pads: shape width x height; smd on the part's side, far side on the other; paste and mask are expansions set on the pad)
"6-SOT DRL0006A" [mm] "SOTFL, 6-Leads, Body 1,60x1,60mm, Pitch 0,50mm, IPC High Density"
  rect 0.67x0.3 smd mask+0.05: 1(-0.74,0.5) 2(-0.74,0) 3(-0.74,-0.5) 4(0.74,-0.5) 5(0.74,0) 6(0.74,0.5)
  silkscreen extent -0.87,-0.85 0.05,1.32, body extent -0.8,-0.85 0.8,0.85, height 0.6
"8-SOIC 3.9" [mm] "SOIC, 8-Leads, Body 4,90x3,90mm, Pitch 1,27mm, IPC High Density"
  rect 1.55x0.6 smd: 1(-2.7,1.905) 2(-2.7,0.635) 3(-2.7,-0.635) 4(-2.7,-1.905) 5(2.7,-1.905) 6(2.7,-0.635) 7(2.7,0.635) 8(2.7,1.905)
  silkscreen extent -2.82,-2.45 1.55,2.88, body extent -3,-2.45 3,2.45, height 1.75
16-UGFN [mm] "QFN, 16-Leads, Body 1,80x2,60mm, Pitch 0,40mm, IPC High Density"
  rect 0.7x0.2 smd mask+0.052: 1(-0.75,0.6)
  rect 0.6x0.2 smd mask+0.052: 2(-0.8,0.2) 3(-0.8,-0.2) 4(-0.8,-0.6) 9(0.8,-0.6) 10(0.8,-0.2) 11(0.8,0.2) 12(0.8,0.6)
  rect 0.2x0.6 smd mask+0.052: 5(-0.6,-1.2) 6(-0.2,-1.2) 7(0.2,-1.2) 8(0.6,-1.2) 13(0.6,1.2) 14(0.2,1.2) 15(-0.2,1.2) 16(-0.6,1.2)
  silkscreen extent -1.27,1.58 -1.18,1.67, body extent -0.97,-1.38 0.97,1.38, height 0.55
1600BL15B100 [mm] "1.7GHz 1:2 Ratio RF Balun, EIA 0805 SMD"
  rect 0.5x0.3 smd: 1(-0.65,0.65) 2(-0.65,0) 3(-0.65,-0.65) 4(0.65,-0.65) 5(0.65,0) 6(0.65,0.65)
  silkscreen extent -1.06,0.64 -0.96,0.74, body extent -0.73,-1.05 0.73,1.05, height 0.95
36900000 [mm] "Shielding Cabinet Clip"
  rect 0.6x0.9 smd: 1(-3.05,0) 1(3.05,0)
  rect 1.5x0.9 smd: 1(-1.65,0) 1(1.65,0)
  rect 1.2x0.9 smd: 1(0,0)
  body extent -3.25,-0.41 3.25,0.41, height 1.28
AD9690 [mm] "AD9690 9 x 9mm, 64 pin, 0.5 pitch 7.6sq Pad"
  oval 0.6x0.3 smd: 1(-4.4,3.75) 2(-4.4,3.25) 3(-4.4,2.75) 4(-4.4,2.25) 5(-4.4,1.75) 6(-4.4,1.25) 7(-4.4,0.75) 8(-4.4,0.25) 9(-4.4,-0.25) 10(-4.4,-0.75) 11(-4.4,-1.25) 12(-4.4,-1.75) 13(-4.4,-2.25) 14(-4.4,-2.75) 15(-4.4,-3.25) 16(-4.4,-3.75) 33(4.4,-3.75) 34(4.4,-3.25) 35(4.4,-2.75) 36(4.4,-2.25) 37(4.4,-1.75) 38(4.4,-1.25) 39(4.4,-0.75) 40(4.4,-0.25) 41(4.4,0.25) 42(4.4,0.75) 43(4.4,1.25) 44(4.4,1.75) 45(4.4,2.25) 46(4.4,2.75) 47(4.4,3.25) 48(4.4,3.75)
  oval 0.3x0.6 smd: 17(-3.75,-4.4) 18(-3.25,-4.4) 19(-2.75,-4.4) 20(-2.25,-4.4) 21(-1.75,-4.4) 22(-1.25,-4.4) 23(-0.75,-4.4) 24(-0.25,-4.4) 25(0.25,-4.4) 26(0.75,-4.4) 27(1.25,-4.4) 28(1.75,-4.4) 29(2.25,-4.4) 30(2.75,-4.4) 31(3.25,-4.4) 32(3.75,-4.4) 49(3.75,4.4) 50(3.25,4.4) 51(2.75,4.4) 52(2.25,4.4) 53(1.75,4.4) 54(1.25,4.4) 55(0.75,4.4) 56(0.25,4.4) 57(-0.25,4.4) 58(-0.75,4.4) 59(-1.25,4.4) 60(-1.75,4.4) 61(-2.25,4.4) 62(-2.75,4.4) 63(-3.25,4.4) 64(-3.75,4.4)
  rect 7.6x7.6 smd: 65(0,0)
  rect 1.5x1.5 on Bottom Paste: ""(-2.625,-2.625) ""(-2.625,-0.875) ""(-2.625,0.875) ""(-2.625,2.625) ""(-0.875,-2.625) ""(-0.875,-0.875) ""(-0.875,0.875) ""(-0.875,2.625) ""(0.875,-2.625) ""(0.875,-0.875) ""(0.875,0.875) ""(0.875,2.625) ""(2.625,-2.625) ""(2.625,-0.875) ""(2.625,0.875) ""(2.625,2.625)
  silkscreen extent -5.47,-4.7 4.7,4.7, body extent -4.57,-4.57 4.57,4.57, height 0.8
ADL5910 [mm] "16-Lead Lead Frame Chip Scale Package [LFCSP]  3 mm × 3 mm Body and 0.75 mm Package Height  (CP-16-22)"
  oval 0.4x0.23 smd: 1(-1.3,0.75) 2(-1.3,0.25) 3(-1.3,-0.25) 4(-1.3,-0.75) 9(1.3,-0.75) 10(1.3,-0.25) 11(1.3,0.25) 12(1.3,0.75)
  oval 0.23x0.4 smd: 5(-0.75,-1.3) 6(-0.25,-1.3) 7(0.25,-1.3) 8(0.75,-1.3) 13(0.75,1.3) 14(0.25,1.3) 15(-0.25,1.3) 16(-0.75,1.3)
  rect 1.6x1.6 smd: 17(0,0)
  silkscreen extent -2.32,-1.55 1.55,1.55, body extent -1.55,-1.55 1.55,1.55, height 0.8
ADP124_125 [mm] "8-Lead Lead Frame Chip Scale Package [LFCSP_UD]  2 mm × 2 mm Body, Ultra Thin, Dual Lead  (CP-8-10)"
  rect 0.35x0.25 smd: 1(-0.9,0.75) 2(-0.9,0.25) 3(-0.9,-0.25) 4(-0.9,-0.75) 5(0.9,-0.75) 6(0.9,-0.25) 7(0.9,0.25) 8(0.9,0.75)
  rect 1x1.6 smd: 9(0,0)
  silkscreen extent -1.5,-1.2 1.05,1.25, body extent -1.15,-1.05 1.15,1.05, height 0.55
AP2210K-3.3TRG1 [mm] "SOT23, 5-Leads, Body 2.96x2.83mm, Pitch 0.95mm, IPC High Density"
  rect 1x0.7 smd: 1(-1.3,0.95) 2(-1.3,0) 3(-1.3,-0.95) 4(1.3,-0.95) 5(1.3,0.95)
  silkscreen extent -1.42,-1.55 0.45,1.97, body extent -1.5,-1.55 1.5,1.55, height 1.45
"CAP 0201/0603 KK"#1 [mm] "Chip Capacitor, 2-Leads, Body 0.60x0.30mm, IPC High Density"
  rect 0.3x0.32 smd mask+0.062: 1(-0.26,0) 2(0.26,0)
  silkscreen extent -0.58,-0.33 0.58,0.33, body extent -0.3,-0.15 0.3,0.15, height 0.3
"CAP 0201/0603 KK"#2 [mm] "Chip Capacitor, 2-Leads, Body 0.60x0.30mm, IPC High Density"
  rect 0.3x0.32 smd: 1(-0.26,0) 2(0.26,0)
  silkscreen extent -0.58,-0.33 0.58,0.33, body extent -0.3,-0.15 0.3,0.15, height 0.3
"CAP 0402/1005 RF KK" [mm] "Chip Capacitor, 2-Leads, Body 1.02x0.51mm, IPC High Density"
  rect 0.55x0.65 smd: 1(-0.525,0) 2(0.525,0)
  silkscreen extent -0.87,-0.45 0.87,0.45, body extent -0.5,-0.26 0.5,0.26, height 0.52
"CAP 0603/1608 RF" [mm] "Chip Capacitor, 2-Leads, Body 1.60x0.80mm, IPC High Density"
  rect 0.8x0.9 smd: 1(-0.625,0) 2(0.625,0)
  silkscreen extent -1.2,-0.63 1.2,0.63, body extent -0.8,-0.41 0.8,0.41, height 0.82
CLA4611-085LF [mm] "PSON, 2-Leads, Body 2,00x2,00mm, Pitch 0,00mm, Thermal Pad 1,70x0,50mm, IPC High Density"
  rect 0.55x0.27 smd: 1(0.875,0) 3(-0.875,0)
  rect 0.5x1.7 smd: 2(0,0)
  silkscreen extent -1.6,-1.15 1.15,1.2, body extent -1,-1 1,1, height 1
FCSL110R005FERCT-ND [mm] "Wide 4320 (11050 Metric), 2043"
  rect 1.05x11.2 smd: 1(-2.3,0) 2(2.3,0)
  silkscreen extent -1.4,-5.5 1.4,5.5, body extent -2.8,-5.6 2.8,5.6, height 0.8
"FER 0402/1005 KK" [mm] "Chip Ferrite, 2-Leads, Body 1.02x0.51mm, IPC Medium Density"
  rect 0.6x0.64 smd: 1(-0.44,0) 2(0.44,0)
  silkscreen extent -1,-0.5 1,0.5, body extent -0.5,-0.26 0.5,0.26, height 0.52
"FER 0603/1608 KK" [mm] "Chip Ferrite, 2-Leads, Body 1.60x0.80mm, IPC Medium Density"
  rect 0.9x1 smd: 1(-0.675,0) 2(0.675,0)
  silkscreen extent -1.4,-0.7 1.4,0.7, body extent -0.8,-0.41 0.8,0.41, height 0.82
Fiducials [mm]
  round 1 smd paste-10 mask+0.5: 0(0,0)
  round 1 smd far side paste-10 mask+0.5: 0(0,0)
  KeepOutLayer circle w0.01: c0,0 r1
GPS05605 [mm] "SOT343, 4-Leads, Body 2,00x2,15mm, Pitch 1,30mm, IPC High Density"
  rect 0.5x0.35 smd: 1(-1.05,0.65) 3(1.05,-0.65) 4(1.05,0.65)
  rect 0.5x0.65 smd: 2(-1.05,-0.5)
  silkscreen extent -1.1,-1 0.65,1.17, body extent -1.22,-1 1.22,1, height 0.9
HMC472ALP4E [mm] "24-VFQFN Exposed Pad"
  rect 0.35x0.25 smd: 1(-1.825,1.25) 2(-1.825,0.75) 3(-1.825,0.25) 4(-1.825,-0.25) 5(-1.825,-0.75) 6(-1.825,-1.25) 13(1.825,-1.25) 14(1.825,-0.75) 15(1.825,-0.25) 16(1.825,0.25) 17(1.825,0.75) 18(1.825,1.25)
  rect 0.25x0.35 smd: 7(-1.25,-1.825) 8(-0.75,-1.825) 9(-0.25,-1.825) 10(0.25,-1.825) 11(0.75,-1.825) 12(1.25,-1.825) 19(1.25,1.825) 20(0.75,1.825) 21(0.25,1.825) 22(-0.25,1.825) 23(-0.75,1.825) 24(-1.25,1.825)
  rect 2.8x2.8 smd: 25(0,0)
  silkscreen extent -2.82,-2.05 2.05,2.05, body extent -2.05,-2.05 2.05,2.05, height 0.39
INA226 [mm] "TSSOP, 10-Leads, Body 3,00x3,00mm, Pitch 0,50mm, IPC Medium Density"
  rect 1.45x0.3 smd: 1(-2.2,1) 2(-2.2,0.5) 3(-2.2,0) 4(-2.2,-0.5) 5(-2.2,-1) 6(2.2,-1) 7(2.2,-0.5) 8(2.2,0) 9(2.2,0.5) 10(2.2,1)
  silkscreen extent -2.32,-1.55 1.15,1.82, body extent -2.45,-1.55 2.45,1.55, height 1.1